# Altium PCB BD4_dy_V1.0.PcbDoc (part 1 of 2)
Units mil, origin at the board's own origin, x right, y up, seen from the top; angles counter-clockwise.
Board outline 5358.3 x 5259.87 mil, 4 copper layers (Top Layer, Signal Layer 1, Signal Layer 2, Bottom Layer), stack 30.634 mil thick; 170 components, 120 nets, 593 pads, 159 vias.
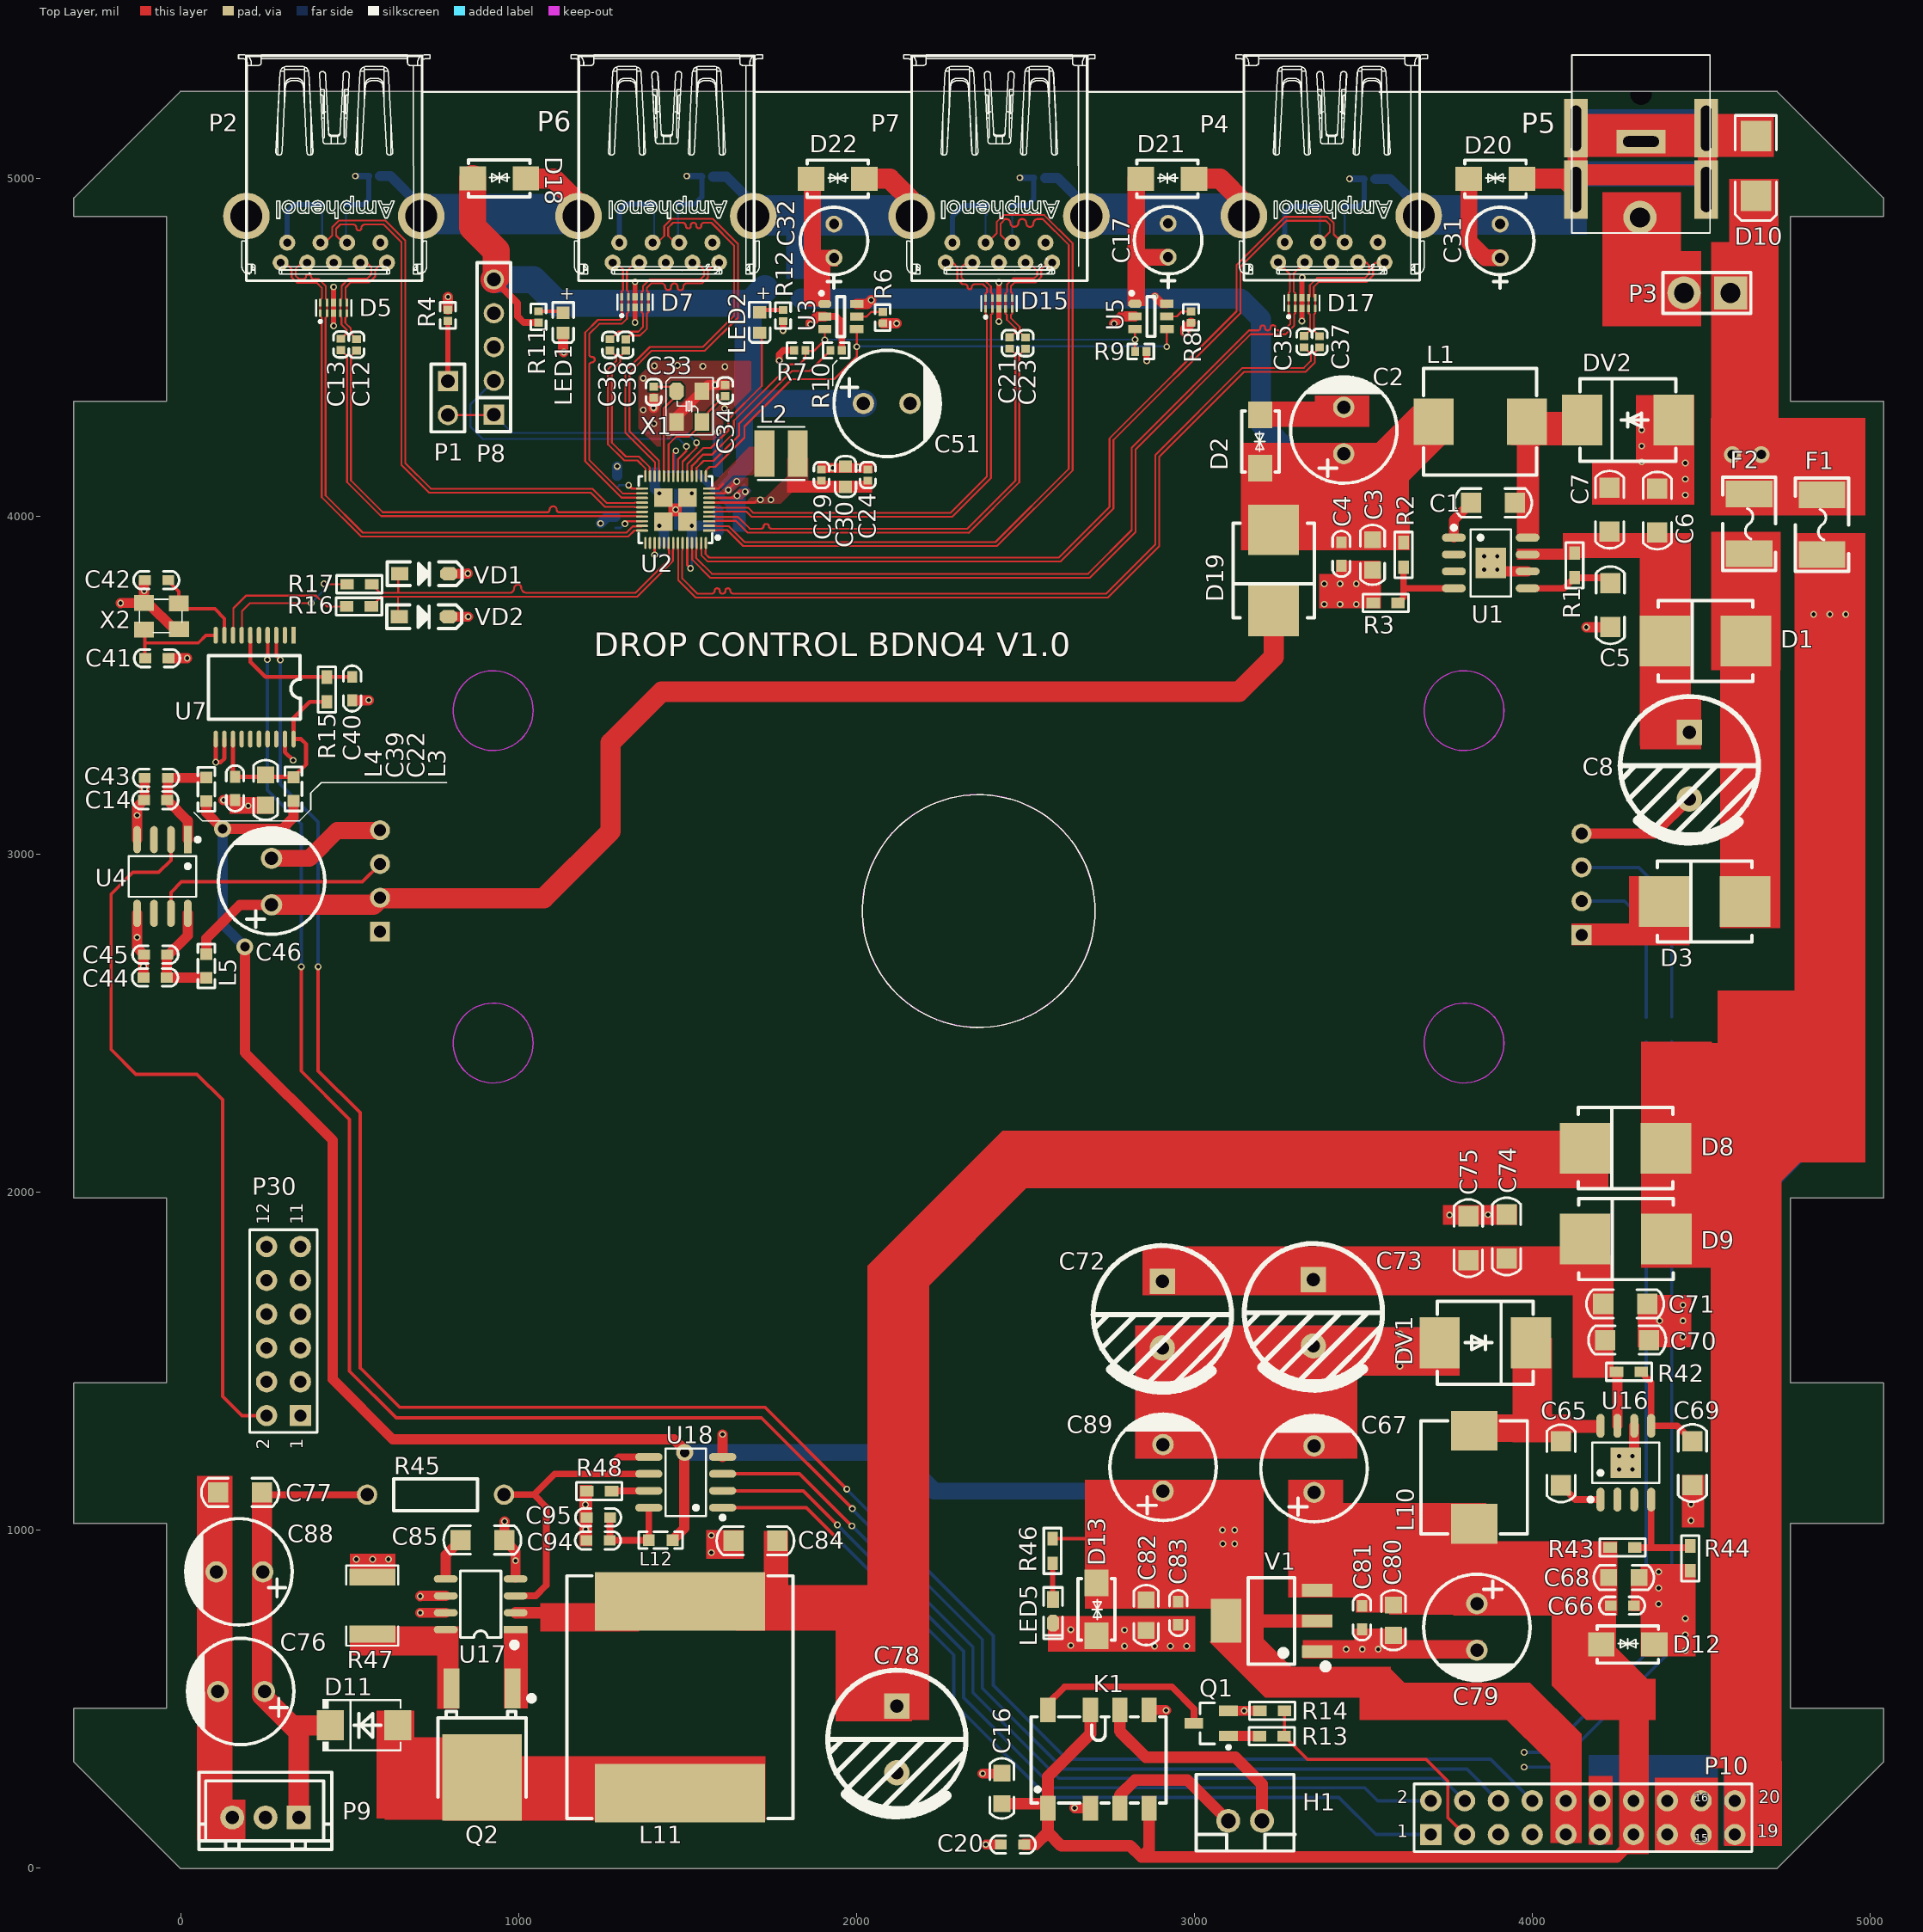
[diagram p0: Top Layer view]
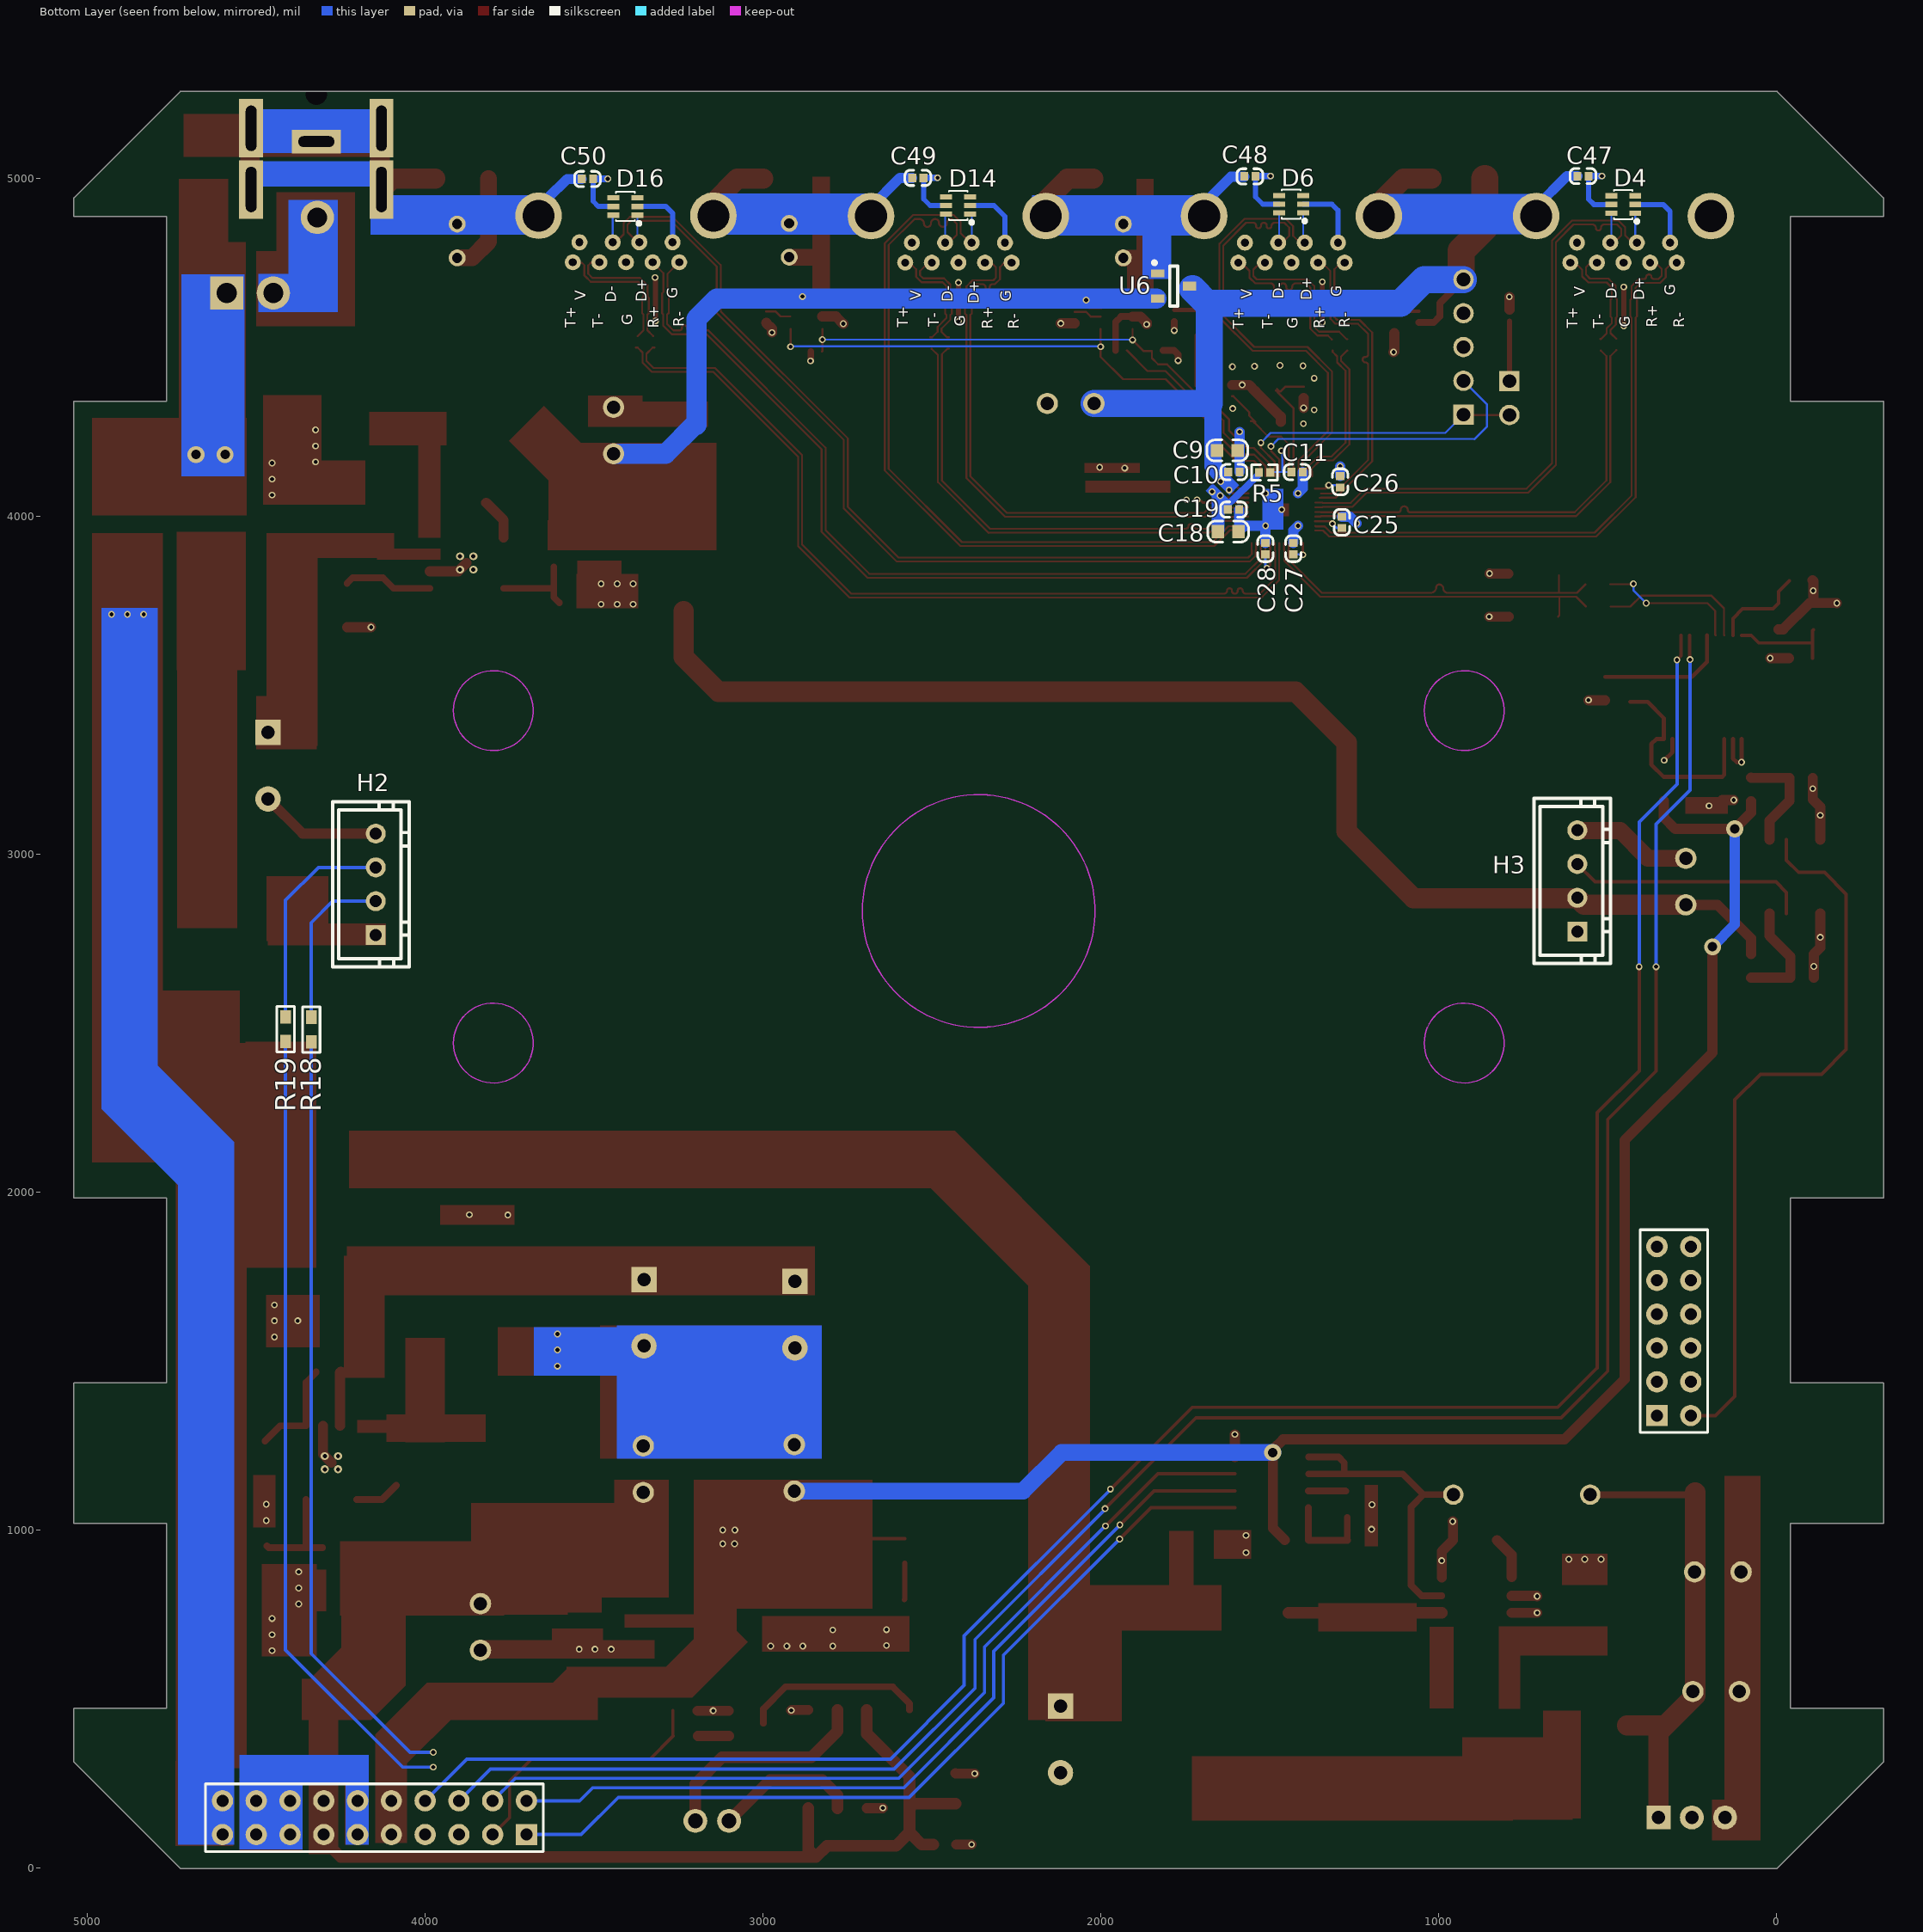
[diagram p1: Bottom Layer view, seen from below]
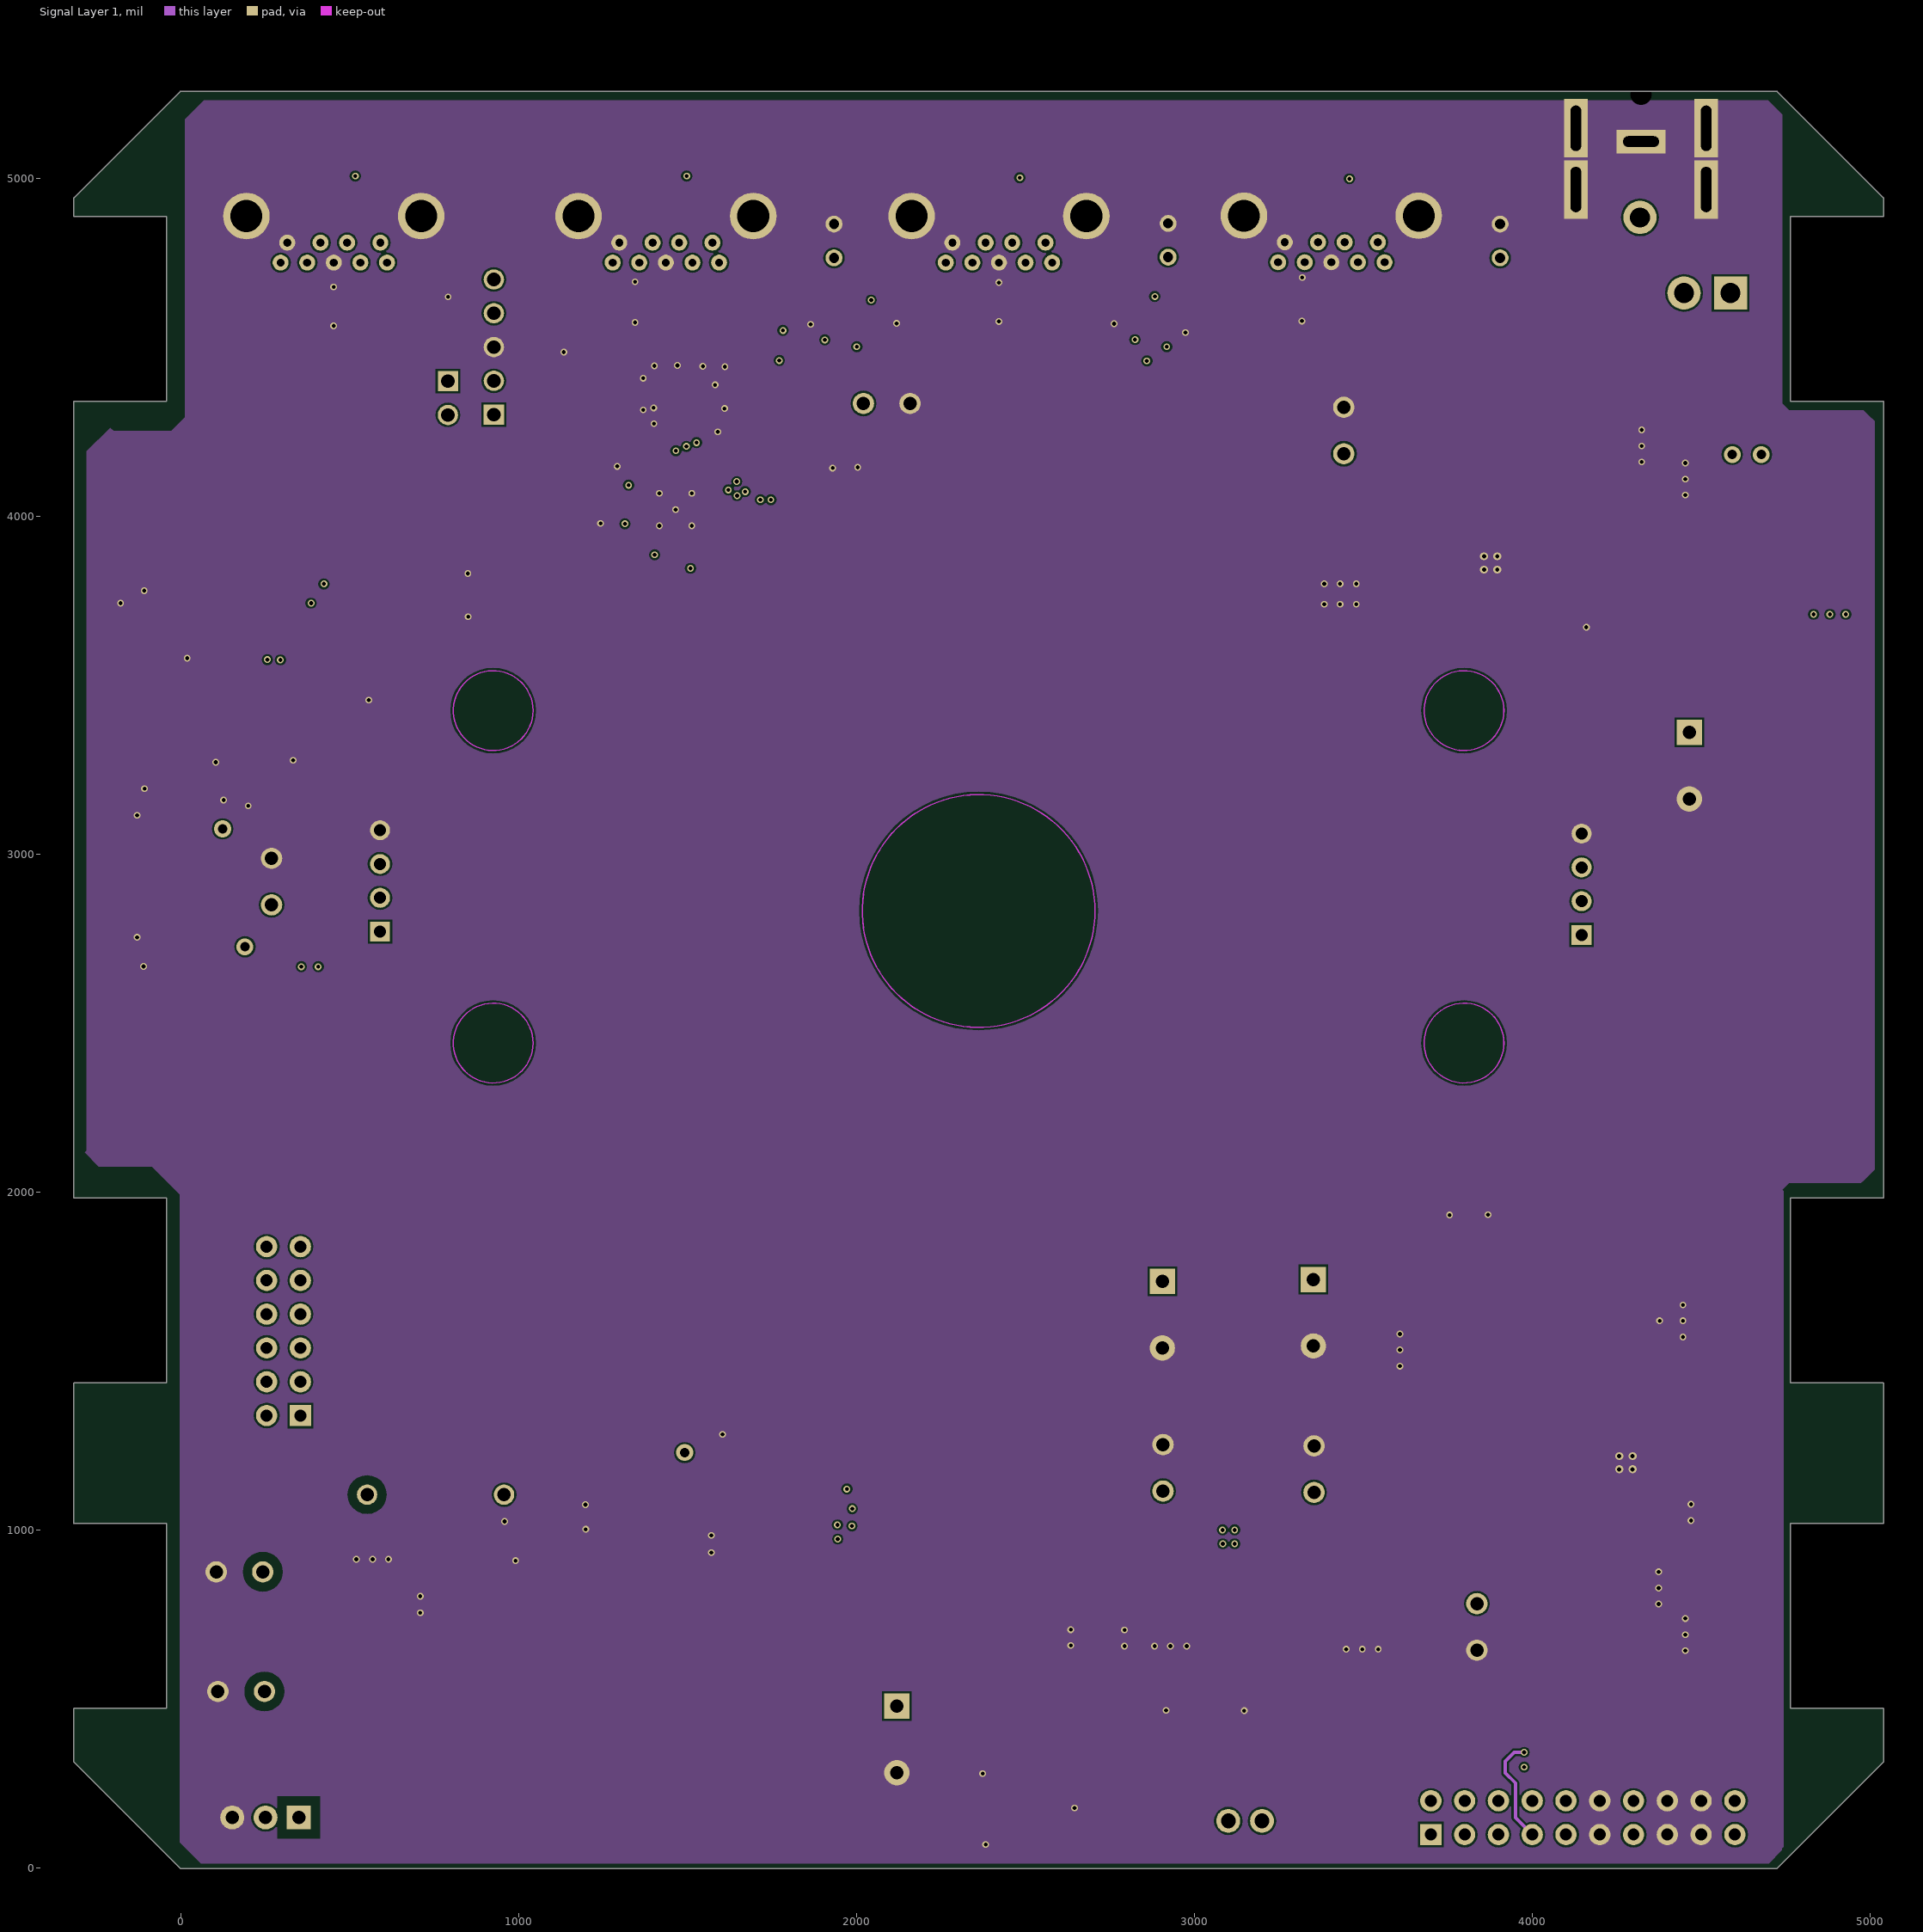
[diagram p2: Signal Layer 1]
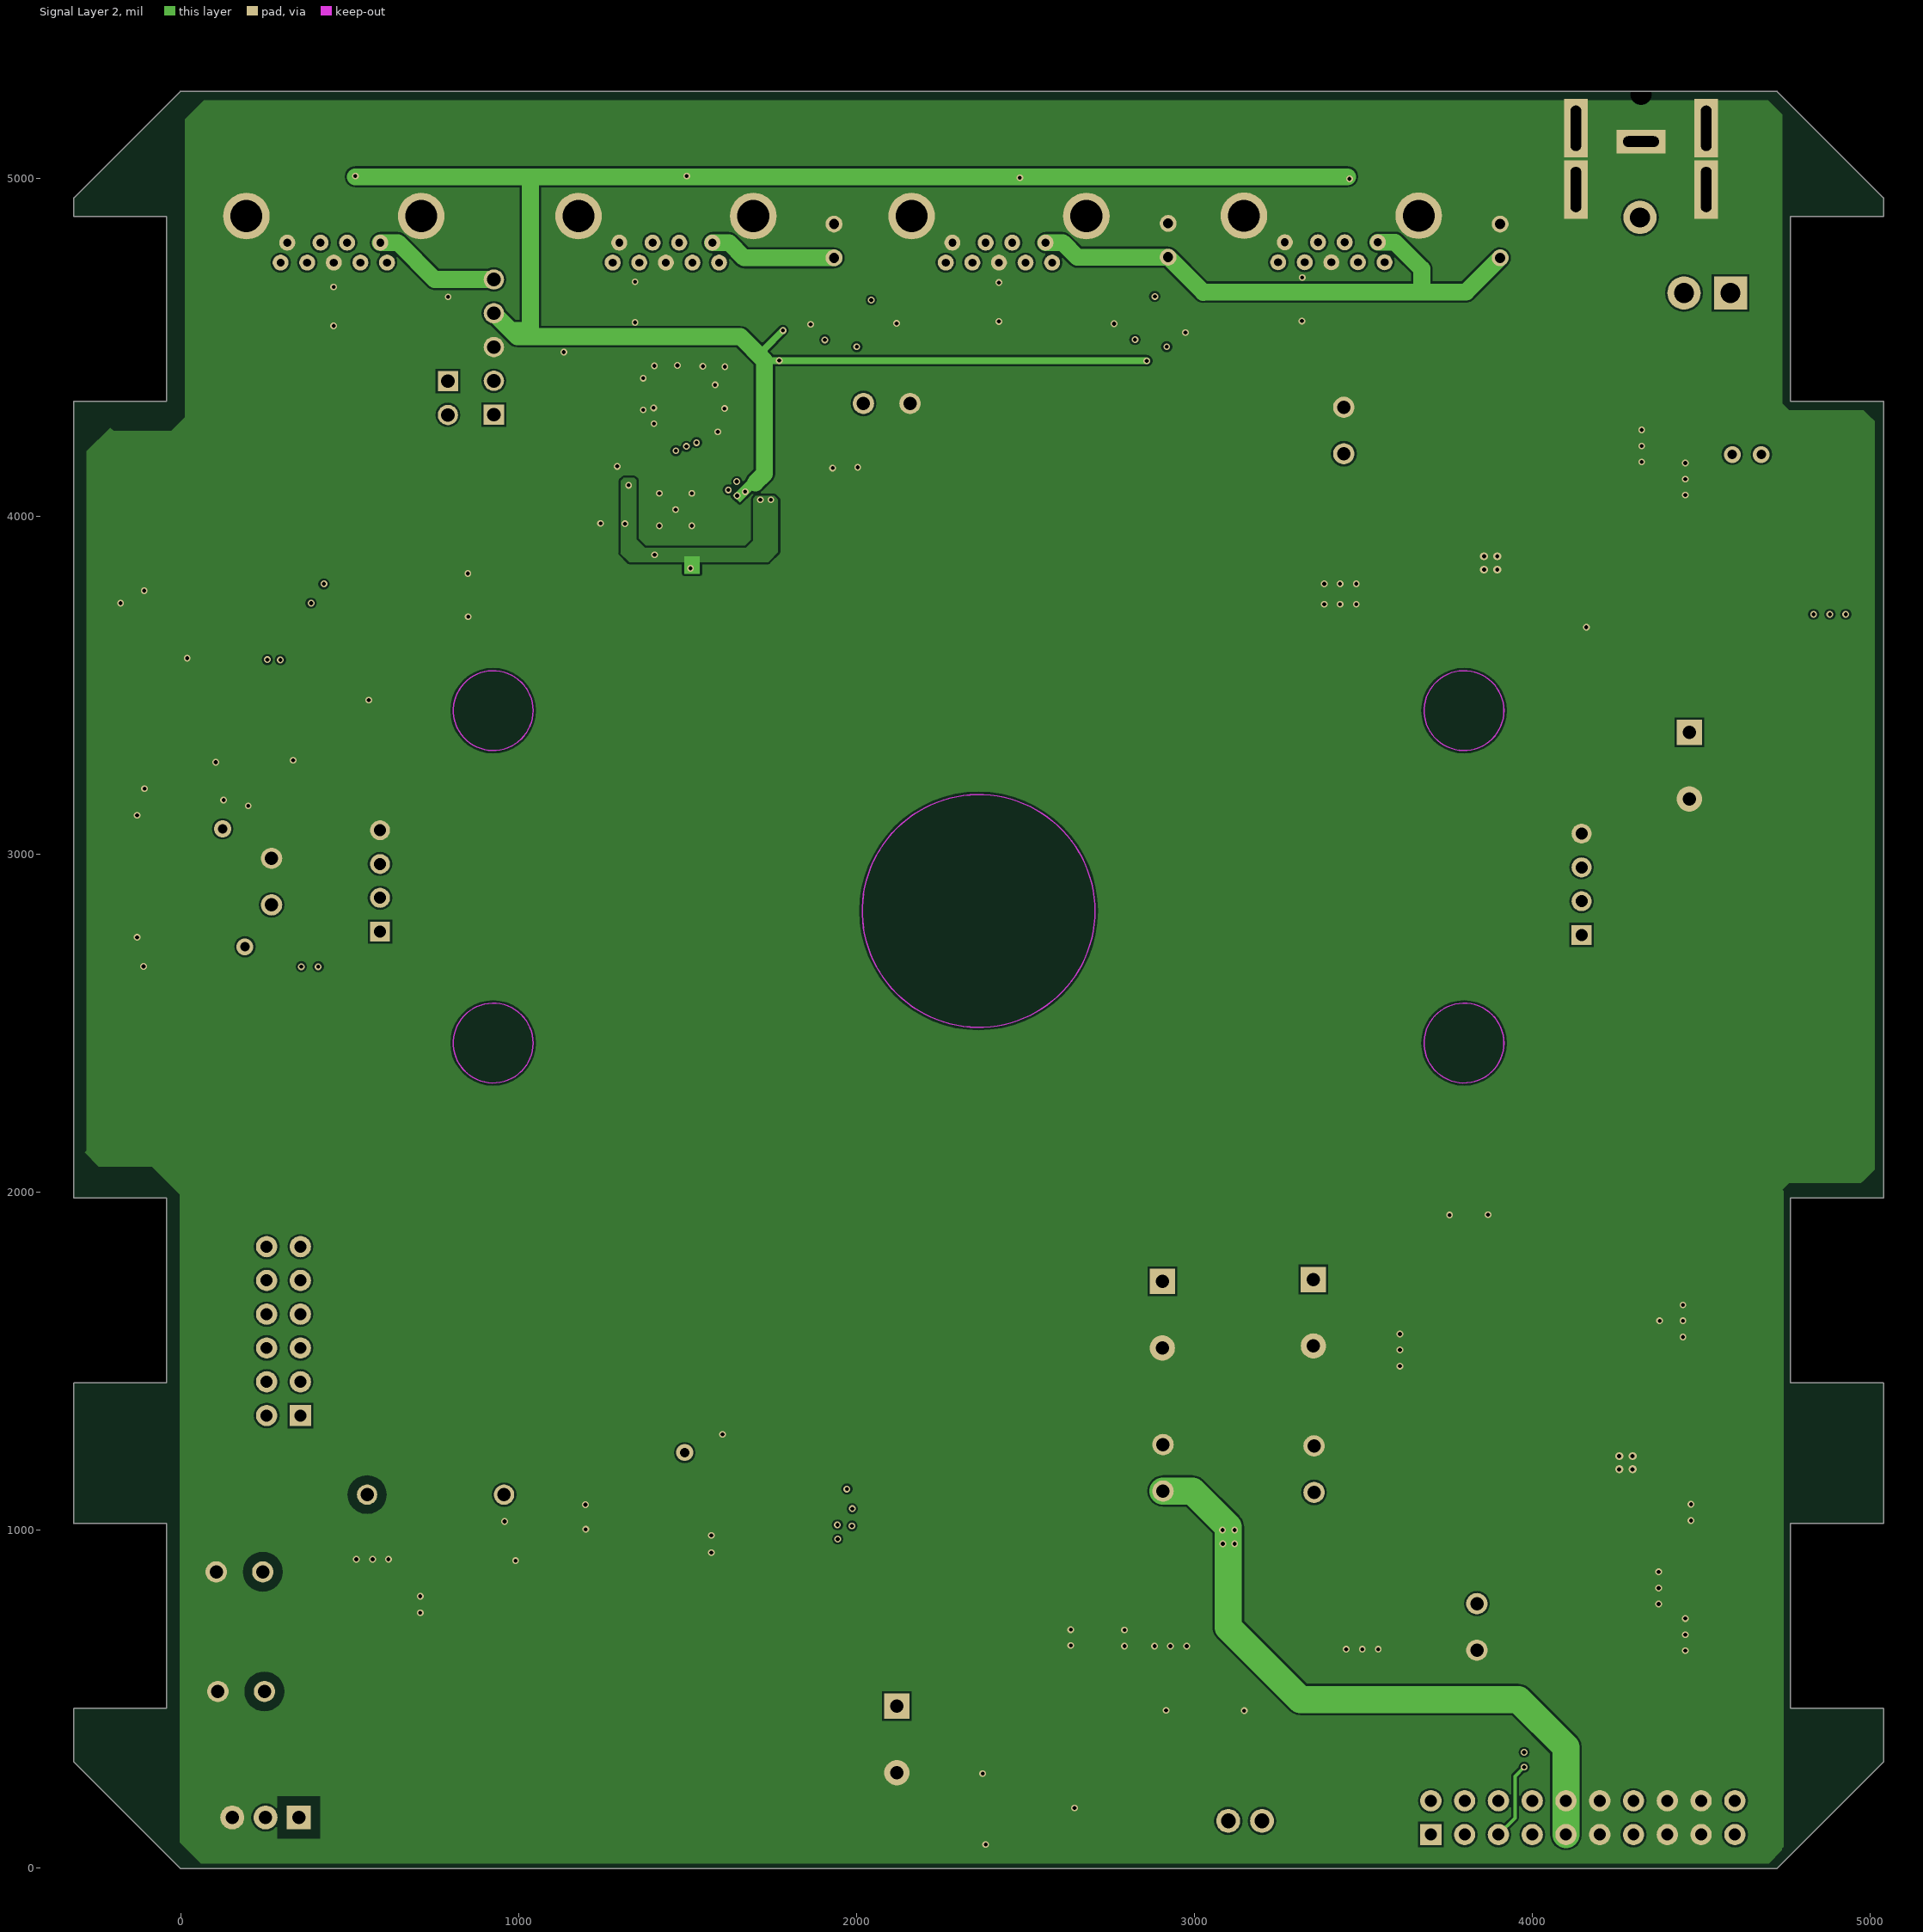
[diagram p3: Signal Layer 2]

## Layer stack, top to bottom
Top Layer: signal copper 1.4
Dielectric: core 10, FR-4, Dk 4.2
Signal Layer 1: signal copper 1.417
Dielectric: prepreg 5, Dk 4.2
Signal Layer 2: signal copper 1.417
Dielectric: core 10, Dk 4.2
Bottom Layer: signal copper 1.4

## Board outline
-316.94,469.82 cw(c-314.96,469.82) -314.96,471.8 -41.35,471.8 -41.35,1019.02 -314.96,1019.02 cw(c-314.96,1021) -316.94,1021 -316.94,1433.07 cw(c-314.96,1433.07) -314.96,1435.05 -41.35,1435.05 -41.35,1982.27 -314.96,1982.27 cw(c-314.96,1984.25) -316.94,1984.25 -316.94,4338.58 cw(c-314.96,4338.58) -314.96,4340.57 -41.35,4340.57 -41.35,4887.78 -314.96,4887.78 cw(c-314.96,4889.76) -316.94,4889.76 -316.94,4940.94 cw(c-314.96,4940.94) -316.35,4942.36 -316.36,4942.35 -1.4,5257.31 -1.41,5257.3 cw(c0,5255.91) 0,5257.89 4724.41,5257.89 cw(c4724.41,5255.91) 4725.82,5257.3 4725.81,5257.31 4725.82,5257.3 5040.76,4942.36 cw(c5039.37,4940.94) 5041.35,4940.94 5041.35,4889.76 cw(c5039.37,4889.76) 5039.37,4887.78 4765.76,4887.78 4765.76,4340.57 5039.37,4340.57 cw(c5039.37,4338.58) 5041.35,4338.58 5041.35,1984.25 cw(c5039.37,1984.25) 5039.37,1982.27 4765.76,1982.27 4765.76,1435.05 5039.37,1435.05 cw(c5039.37,1433.07) 5041.35,1433.07 5041.35,1021.18 cw(c5039.37,1021.18) 5039.37,1019.2 4765.76,1019.2 4765.76,471.98 5039.37,471.98 cw(c5039.37,470) 5041.35,470 5041.35,314.96 cw(c5039.37,314.96) 5040.76,313.55 5040.77,313.56 4725.81,-1.4 4725.82,-1.39 cw(c4724.41,0) 4724.41,-1.98 0,-1.98 cw(c0,0) -1.41,-1.39 -1.4,-1.4 -316.36,313.56 -316.35,313.55 cw(c-314.96,314.96) -316.94,314.96

## Design rules (kind name [scope] priority, off if disabled: settings)
Clearance Clearance_2 [InComponent('U4')] p1: gap=7
Clearance Clearance_4 [InComponent('U11')] p2: gap=7
Clearance Clearance_1 [InComponent('USB1')] p3: gap=6
Clearance Clearance_3 [InNetClass('HV Class')] p4: gap=27
Clearance [All] p5: gap=6
DiffPairsRouting DiffPair_UsbDiffPairsRouting [InDifferentialPairClass('90oum')] p1: maxlimit=6 minlimit=6 mostfreqgap=6 maxuncoupledlength=500
DiffPairsRouting [All] p2: maxlimit=6 minlimit=6 mostfreqgap=6 maxuncoupledlength=10
HoleSize [All] p1: absolutevalues=TRUE maxlimit=99999 minlimit=1 maxpercent=80.000 minpercent=20.000
MatchedLengths DiffPair_UsbMatchedLengths [All] p1: tolerance=5 checknetsindiffpair=TRUE checkdiffpairvsdiffpair=TRUE checkothers=TRUE
MinimumSolderMaskSliver [All] p1: minsoldermaskwidth=0
PlaneConnect [InPadClass('All Pads')] p1: planeconnectstyle=Direct reliefexpansion=20 reliefentries=4 reliefconductorwidth=10 reliefairgap=10
PolygonConnect PolygonConnect_2 [IsVia] p1: connectstyle=Direct reliefconductorwidth=10 reliefentries=4 polygonreliefangle="90 Angle" airgapwidth=10
PolygonConnect PolygonConnect_1 [All vs InNet('GND')] p2: connectstyle=Direct reliefconductorwidth=10 reliefentries=4 polygonreliefangle="90 Angle" airgapwidth=10
PolygonConnect [All] p3: connectstyle=Direct reliefconductorwidth=10 reliefentries=4 polygonreliefangle="90 Angle" airgapwidth=10
RoutingVias RoutingVias_1 [All] p1: holewidth=12 width=20 viastyle="Through Hole" minholewidth=12 minwidth=20 maxholewidth=12 maxwidth=20
RoutingVias [All] p2: holewidth=12 width=100 viastyle="Through Hole" minholewidth=20 minwidth=100 maxholewidth=50 maxwidth=100
SilkToSilkClearance [All] p1: silktosilkclearance=0
SilkToSolderMaskClearance [IsPad] p1: minsilkscreentomaskgap=0 clearancetoexposedcopper=TRUE
SolderMaskExpansion [All] p1: expansion=4
Width DiffPair_UsbWidth [InDifferentialPairClass('90oum')] p1: maxlimit=5.59 minlimit=5.59 preferedwidth=5.59
Width [All] p2: maxlimit=200 minlimit=5.59 preferedwidth=5.59
22 further rules are at their usual default settings.

## Classes and differential pairs
net class "HV Class": NetC76_1 NetD11_2
differential pair class 90oum: P1_AS_DX P1_SS_RX P1_SS_TX P1C P2_AS_DX P2_SS_RX P2_SS_TX P2C P3_AS_DX P3_SS_RX P3_SS_TX P3C P4_AS_DX UP_AS_DX UP_SS_RX UP_SS_TX UPC
component class USBhub-CH634M-R0-1v1: C9 C10 C11 C12 C13 C17 C18 C19 C21 C23 C24 C25 C26 C27 C28 C29 C30 C31 C32 C33 C34 C35 C36 C37 C38 C47 C48 C49 C50 C51 D4 D5 D6 D7 D14 D15 D16 D17 D18 D20 D21 D22 L2 LED1 LED2 P1 P2 P4 P6 P7 P8 R4 R5 R6 R7 R8 R9 R10 R11 R12 U2 U3 U5 U6 X1
component class Power: C1 C2 C3 C4 C5 C6 C7 C8 C65 C66 C67 C68 C69 C70 C71 C72 C73 C74 C75 C76 C77 C78 C79 C80 C81 C82 C83 C84 C85 C88 C89 C94 C95 D1 D2 D3 D8 D9 D10 D11 D12 D13 DV1 DV2 F1 F2 L1 L10 L11 L12 LED5 P3 P5 Q2 R1 R2 R3 R42 R43 R44 R45 R46 R47 R48 U1 U16 U17 U18 V1
component class Connect: C14 C16 C20 C22 C39 C40 C41 C42 C43 C44 C45 C46 D19 H1 H2 H3 K1 L3 L4 L5 P9 P10 P30 Q1 R13 R14 R15 R16 R17 R18 R19 U4 U7 VD1 VD2 X2
differential pair UP_SS_TX: +UP_SS_TX_P -UP_SS_TX_N
differential pair UP_AS_DX: +UP_AS_DX_P -UP_AS_DX_N
differential pair P4_AS_DX: +P4_AS_DX_P -P4_AS_DX_N
differential pair P3_SS_TX: +P3_SS_TX_P -P3_SS_TX_N
differential pair P3_SS_RX: +P3_SS_RX_P -P3_SS_RX_N
differential pair P3_AS_DX: +P3_AS_DX_P -P3_AS_DX_N
differential pair P2_SS_TX: +P2_SS_TX_P -P2_SS_TX_N
differential pair P2_SS_RX: +P2_SS_RX_P -P2_SS_RX_N
differential pair P2_AS_DX: +P2_AS_DX_P -P2_AS_DX_N
differential pair P1_SS_TX: +P1_SS_TX_P -P1_SS_TX_N
differential pair P1_SS_RX: +P1_SS_RX_P -P1_SS_RX_N
differential pair P1_AS_DX: +P1_AS_DX_P -P1_AS_DX_N
differential pair UP_SS_RX: +UP_SS_RX_P -UP_SS_RX_N
differential pair P1C: +P1C_P -P1C_N
differential pair P2C: +P2C_P -P2C_N
differential pair P3C: +P3C_P -P3C_N
differential pair UPC: +UPC_P -UPC_N

## Components (designator, comment, footprint, x,y, rotation, side; value= is the part's Value field where it differs from the comment)
C1 "0.01uF" "C 1206" 3885,4040 r180 top
C2 "470uF /16V" CAP-TH_BD8.0-P3.50-D0.6-FD 3443,4254 r90 top
C3 "10uF" "C 0805" 3528,3886 r90 top
C4 "0.1uF" "C 0603" 3436,3889 r90 top
C5 "0.1uF/50V" "C 1206" 4232,3737 r90 top
C6 "0.1uF/50V" "C 1206" 4371,4017 r270 top
C7 "10uF/50V" "C 1206" 4230,4020 r270 top
C8 "220UF/50V" "CAP 5.0*10*12.5" 4466,3262 r270 top
C9 "10uF" 0603_C 1596,4195 r0 bottom
C10 "0.1uF" 0402_C 1590,4131 r270 bottom
C11 "NC(0.1uF)" 0402_C 1403,4131 r270 bottom
C12 "0.1uF" 0402_C 474.6,4525.3 r0 top
C13 "0.1uF" 0402_C 520.5,4524.3 r0 top
C14 "1uF" "C 0603" -75,3160 r180 top
C16 "10uF" "C 0805" 2431,235 r270 top
C17 "100uF" CD0.1 2923,4767 r90 top
C18 "10uF" 0603_C 1654,3955 r180 bottom
C19 "0.1uF" 0402_C 1591,4020 r270 bottom
C20 "0.1uF" "C 0603" 2463,69 r0 top
C21 "0.1uF" 0402_C 2453.9,4529.7 r0 top
C22 "10uF" "C 0805" 251.32,3190 r90 top
C23 "0.1uF" 0402_C 2501.4,4529.1 r0 top
C24 "0.1uF" 0402_C 2034,4139 r0 top
C25 "0.1uF" 0402_C 1287,3999 r180 bottom
C26 "0.1uF" 0402_C 1292,4119 r180 bottom
C27 "0.1uF" 0402_C 1430.55,3921.02 r180 bottom
C28 "0.1uF" 0402_C 1513.23,3921.02 r180 bottom
C29 "1uF" 0402_C 1897,4139 r0 top
C30 "10uF" 0603_C 1968,4087 r90 top
C31 "100uF" CD0.1 3906,4765 r90 top
C32 "100uF" CD0.1 1934,4765 r90 top
C33 "20pF" 0402_C 1400,4384 r0 top
C34 "20pF" 0402_C 1612,4389 r0 top
C35 "0.1uF" 0402_C 3326,4533.8 r0 top
C36 "0.1uF" 0402_C 1271,4524 r0 top
C37 "0.1uF" 0402_C 3371.8,4533.3 r0 top
C38 "0.1uF" 0402_C 1317.1,4523.8 r0 top
C39 "0.1uF" "C 0603" 161,3195 r90 top
C40 "0.1uF" "C 0603" 507.5,3490.5 r90 top
C41 "20PF" "C 0603" -70,3580 r0 top
C42 "20PF" "C 0603" -72,3811 r180 top
C43 "0.1uF" "C 0603" -73,3226 r180 top
C44 "0.1uF" "C 0603" -76,2635 r180 top
C45 "1uF" "C 0603" -75,2703 r180 top
C46 "470uF /16V" CAP-TH_BD8.0-P3.50-D0.6-FD 269,2919 r90 top
C47 "0.1uF" 0402_C 590,5007 r90 bottom
C48 "0.1uF" 0402_C 1576,5006 r90 bottom
C49 "0.1uF" 0402_C 2559,5001.68 r90 bottom
C50 "0.1uF" 0402_C 3537,4998.38 r90 bottom
C51 "470uF /16V" CAP-TH_BD8.0-P3.50-D0.6-FD 2090,4334 r0 top (schematic designator C15)
C65 "0.01uF" "C 1206" 4086,1197 r270 top
C66 "0.1uF" "C 0603" 4267,776 r180 top
C67 "470uF /16V" CAP-TH_BD8.0-P3.50-D0.6-FD 3355,1180 r90 top
C68 "10uF" "C 0805" 4272,859 r180 top
C69 "0.1uF/50V" "C 1206" 4475,1198 r90 top
C70 "0.1uF/50V" "C 1206" 4282,1562 r180 top
C71 "10uF/50V" "C 1206" 4276,1669 r180 top
C72 "220UF/50V" "CAP 5.0*10*12.5" 2906,1637 r270 top
C73 "220UF/50V" "CAP 5.0*10*12.5" 3353,1643 r270 top
C74 "10uF/50V" "C 1206" 3925,1868.69 r270 top
C75 "0.1uF/50V" "C 1206" 3812,1863.69 r270 top
C76 "4.7uF/400V" CAP-TH_BD8.0-P3.50-D0.6-FD 179,522 r180 top
C77 "0.1uF/450V" "C 1206" 176,1111 r0 top
C78 "220UF/50V" "CAP 5.0*10*12.5" 2120,380 r270 top
C79 "470uF /16V" CAP-TH_BD8.0-P3.50-D0.6-FD 3837,713 r270 top
C80 "10uF" "C 0805" 3590,733 r90 top
C81 "0.1uF" "C 0603" 3497,741 r90 top
C82 "10uF" "C 0805" 2858,748 r90 top
C83 "0.1uF" "C 0603" 2953,754 r90 top
C84 "0.1uF/50V" "C 1206" 1701,968 r0 top
C85 "0.1uF/50V" "C 1206" 893,970 r180 top
C88 "4.7uF/400V" CAP-TH_BD8.0-P3.50-D0.6-FD 174,876 r180 top
C89 "470uF /16V" CAP-TH_BD8.0-P3.50-D0.6-FD 2908,1184 r90 top
C94 "1uF" "C 0603" 1235,969 r180 top
C95 "0.1uF" "C 0603" 1236,1037 r180 top
D1 "MBRS330T3" MBRS340 4634,3631 r180 top
D2 "SMAJ5.0CA" SMA_L4.4-W2.6-LS5.0-BI 3196.1,4221.1 r270 top
D3 "MBRS330T3" MBRS340 4631,2860 r180 top
D4 "CH412K" SOT-363_L2.0-W1.3-P0.65-LS2.1-BR 454,4923 r180 bottom
D5 "TPD4E02B04QDQARQ1" USON-10_L2.5-W1.0-P0.50-BL 452.7,4616.7 r0 top
D6 "CH412K" SOT-363_L2.0-W1.3-P0.65-LS2.1-BR 1437,4924 r180 bottom
D7 "TPD4E02B04QDQARQ1" USON-10_L2.5-W1.0-P0.50-BL 1345,4634 r0 top
D8 "MBRS330T3" MBRS340 4397,2130 r180 top
D9 "MBRS330T3" MBRS340 4398,1861 r180 top
D10 "SMBJ18CA" SMB 4663,5037 r270 top
D11 "ES2J" SMB_L4.4-W3.6-LS5.4-RD 543,422 r0 top
D12 "SMAJ5.0CA" SMA_L4.4-W2.6-LS5.0-BI 4284,661 r180 top
D13 "SMAJ3.3CA" SMA_L4.4-W2.6-LS5.0-BI 2711,765 r90 top
D14 "CH412K" SOT-363_L2.0-W1.3-P0.65-LS2.1-BR 2423,4920 r180 bottom
D15 "TPD4E02B04QDQARQ1" USON-10_L2.5-W1.0-P0.50-BL 2422.2,4629.8 r0 top
D16 "CH412K" SOT-363_L2.0-W1.3-P0.65-LS2.1-BR 3408,4917 r180 bottom
D17 "TPD4E02B04QDQARQ1" USON-10_L2.5-W1.0-P0.50-BL 3319,4631 r0 top
D18 "SMAJ5.0CA" SMA_L4.4-W2.6-LS5.0-BI 943,5000 r180 top
D19 "MBRS330T3" MBRS340 3235.6,3960 r270 top (schematic designator D3)
D20 "SMAJ5.0CA" SMA_L4.4-W2.6-LS5.0-BI 3892,4999 r180 top
D21 "SMAJ5.0CA" SMA_L4.4-W2.6-LS5.0-BI 2921,4999 r180 top
D22 "SMAJ5.0CA" SMA_L4.4-W2.6-LS5.0-BI 1945,4999 r180 top
DV1 "B540C" SMC_L7.1-W6.2-LS8.1-RD 3862,1554 r180 top
DV2 "B540C" SMC_L7.1-W6.2-LS8.1-RD 4284,4285 r0 top
F1 "MSMD200-25V 4A" "FU 1812" 4859,3975 r270 top
F2 "MSMD200-25V 4A" "FU 1812" 4643,3978 r270 top
H1 "Header 2H" CONN-TH_2P-P2.54_ZX-XH2.54-2PZZ-Y 3151,139 r0 top
H2 "#NAME?" CONN-TH_4P-P2.50_ZX-XH2.54-4PZZ-Y 4147,2911 r270 bottom
H3 "#NAME?" CONN-TH_4P-P2.50_ZX-XH2.54-4PZZ-Y 590,2921 r270 bottom
K1 "G6K-2F-Y-DC5" RELAY-SMD_G6K-2F-Y 2717,322 r0 top
L1 "15uH /5A" IND-SMD_L8.5-W8.0_PCC-M0854M 3847,4280 r180 top
L2 "2.2uH" CD32 1777,4186 r0 top
L3 "120欧姆磁珠" "L 0603" 334,3193 r90 top
L4 "120欧姆磁珠" "L 0603" 76,3192 r90 top
L5 "120欧姆磁珠" "L 0603" 76,2669 r90 top
L10 "15uH /5A" IND-SMD_L8.5-W8.0_PCC-M0854M 3829,1156 r270 top
L11 "100uH" IND-SMD_L18.3-W17.0 1478,505 r270 top
L12 "120欧姆磁珠" "L 0603" 1421,970 r180 top
LED1 "5V" 0603+ 1132,4603 r270 top
LED2 "SUSP" 0603+ 1714,4604 r270 top
LED5 "绿色" "LED 0603G" 2582,759 r270 top
P1 "Port Swap" SIP2-2.54mm 791,4400 r180 top
P2 "PC" USB3.0-A-Receptacle 591,4810 r180 top locked
P3 "Header 2" SIP2-3.5mm 4588,4661 r90 top
P4 "Port 3" USB3.0-A-Receptacle 3544,4811 r180 top locked
P5 "DC_plug" POWERPLUG_slc 4323,5365 r0 top locked (schematic designator P3)
P6 "Port 4" USB3.0-A-Receptacle 1574,4810 r180 top locked (schematic designator P3)
P7 "Port 4" USB3.0-A-Receptacle 2560,4810 r180 top locked
P8 "" SIP5-2.54mm 927,4301 r180 top (schematic designator P4)
P9 "HX-XH2.54-3PZZ-R" CONN-TH_3P-P2.50_HX-XH2.54-3PZZ-B 251,149 r0 top
P10 "Header 10X2" HDR-10X2 3700.79,98.43 r0 top
P30 "Header 6X2" HDR-6X2 354.33,1338.58 r90 top
Q1 "9013" SOT23 3050.51,427.75 r180 top
Q2 "MOT65R600D" TO-252-3_L6.6-W6.1-P4.58-LS10.1-BR-1 892,399 r90 top
R1 "100K" "R 0603" 4126,3855 r90 top
R2 "10K" "R 0603" 3620,3886 r270 top
R3 "3.16K" "R 0603" 3567,3744 r180 top
R4 "10K" 0402 791,4578 r90 top
R5 "0Ω(10K)" 0402 1499,4130 r0 bottom
R6 "24K" 0402 2078,4605 r270 top
R7 "NC(51K)" 0402 1816,4491 r0 top
R8 "24K" 0402 2991,4606 r270 top
R9 "NC(51K)" 0402 2859,4488 r180 top
R10 "NC(10K)" 0402 1957,4491 r180 top
R11 "2K" 0402 1059,4607 r270 top
R12 "1K" 0402 1783,4611 r270 top
R13 "1K" "R 0603" 3230,390 r180 top
R14 "10K" "R 0603" 3231,465 r180 top
R15 "0R" "R 0603" 433,3487.5 r90 top
R16 "22R" "R 0603" 528,3733 r0 top
R17 "22R" "R 0603" 529,3799 r0 top
R18 "22R" "R 0603" 4338,2481 r270 bottom
R19 "22R" "R 0603" 4414,2482 r270 bottom
R42 "100K" "R 0603" 4287,1468 r180 top
R43 "10K" "R 0603" 4268,948 r0 top
R44 "3.16K" "R 0603" 4469,916 r270 top
R45 "1.5M" RES-TH_BD2.4-L6.3-P10.30-D0.6 754.5,1104.45 r0 top
R46 "1K" "R 0603" 2581,938 r90 top
R47 "0.1R" "R 1812" 567,776 r90 top
R48 "6.8K" "R 0603" 1239,1115 r180 top
U1 "TPS5450DDAR" SOP-8_L4.9-W3.9-P1.27-LS6.0-BL-EP 3878,3862 r270 top
U2 "CH634M" QFN48_5X5 1465,4020 r90 top
U3 "CH217K" SOT-23-6 1906.75,4628.67 r270 top
U4 "ADUM1200BRZ-RL7" SOIC-8_L4.9-W3.9-P1.27-LS6.0-BL#1 -54,2934 r180 top
U5 "CH217K" SOT-23-6 2825,4629 r270 top
U6 "CH213K" SOT-23-3 1832,4719 r270 bottom
U7 "CH341T" SSOP-20 336,3647 r270 top
U16 "TPS5450DDAR" SOP-8_L4.9-W3.9-P1.27-LS6.0-BL-EP 4278,1199 r0 top
U17 "MAX1771ESA" SOP8_N 888,780 r180 top
U18 "MCP41050-I/SN" SOIC-8_L4.9-W3.9-P1.27-LS6.0-BL#2 1495,1141 r90 top
V1 "AMS1117-3V3" SOT223_M 3229,731 r90 top
VD1 "SMF15CA" SOD-123F 721,3830 r0 top
VD2 "SMF15CA" SOD-123F 720,3703 r0 top
X1 "24MHz" XT3225 1468,4370 r270 top
X2 "12M" XTAL-3225 -57,3704 r270 top

## Footprints (in the part's own frame and the unit in brackets; to place one, negate y for a bottom-side part, rotate by r counter-clockwise, add the part's x,y. Pads: shape width x height; smd on the part's side, far side on the other; paste and mask are expansions set on the pad)
0402 [mm]
  rect 0.6x0.65 smd mask+0.051: 1(0,0) 2(0.85,0)
  silkscreen extent -0.55,-0.58 1.4,0.57
0402_C [mm]
  rect 0.65x0.6 smd mask+0.051: 1(0,0) 2(0,-0.85)
  silkscreen extent -0.58,-1.4 0.57,0.55
0603+ [mm]
  rect 0.93x0.98 smd: 1(0,0) 2(1.54,0)
  silkscreen extent -0.76,-0.79 2.27,0.79
0603_C [mm]
  rect 0.93x0.98 smd mask+0.051: 1(0,0) 2(1.54,0)
  silkscreen extent -0.76,-0.79 2.31,0.79
"C 0603" [mil]
  rect 35x30 smd: 1(-35,0) 2(34,0)
  silkscreen extent -67,-26 67,26, body extent -31,-16 31,16, height 32
"C 0805" [mil]
  rect 50x50 smd: 1(-45,0) 2(45,0)
  silkscreen extent -89,-36 89,36, body extent -39,-24 39,24, height 20
"C 1206" [mil]
  rect 60x60 smd: 1(-65,0) 2(65,0)
  silkscreen extent -115,-42 115,42, body extent -63,-32 63,32, height 48
"CAP 5.0*10*12.5" [mm]
  rect 1.9x1.9 hole 1: 1(-2.5,0)
  round 1.9 hole 1: 2(2.5,0)
  silkscreen extent -5.2,-5.21 5.64,5.2, body extent -5,-5.01 5.01,4.99, height 12.55
CAP-TH_BD8.0-P3.50-D0.6-FD [mm]
  round 1.6 hole 1: 1(-1.75,0) 2(1.75,0)
  silkscreen extent -3.96,-4 4.04,4
CD0.1 [mil]
  round 50 hole 30: 1(0,0) 2(100,0)
  silkscreen extent -90,-100 150,100
CD32 [mm]
  rect 1.5x3.5 smd: 1(-1.25,0) 2(1.25,0)
  silkscreen extent -1.75,-2 1.75,2
CONN-TH_2P-P2.54_ZX-XH2.54-2PZZ-Y [mm]
  round 1.8 hole 1.1 paste+0 mask+0.05: 1(1.27,0) 2(-1.27,0)
  silkscreen extent -3.67,-2.26 3.75,3.49
CONN-TH_3P-P2.50_HX-XH2.54-3PZZ-B [mm]
  rect 1.8x1.8 hole 1 paste+0 mask+0.05: 1(2.5,0)
  round 1.8 hole 1 paste+0 mask+0.05: 2(0,0) 3(-2.5,0)
  silkscreen extent -5,-2.4 5,3.4
CONN-TH_4P-P2.50_ZX-XH2.54-4PZZ-Y [mm]
  rect 1.5x1.5 hole 0.9: 1(3.81,0)
  round 1.5 hole 0.9: 2(1.27,0) 3(-1.27,0) 4(-3.81,0)
  silkscreen extent -6.21,-3.25 6.21,2.5
"FU 1812" [mm]
  rect 2x3.5 smd: 1(-2.25,0) 2(2.25,0)
  silkscreen extent -3.5,-2 3.5,2, body extent -2.3,-1.61 2.3,1.61, height 0.87
HDR-6X2 [mm]
  rect 1.6x1.6 hole 0.9: 1(0,0)
  round 1.6 hole 0.9: 2(0,2.54) 3(2.54,0) 4(2.54,2.54) 5(5.08,0) 6(5.08,2.54) 7(7.62,0) 8(7.62,2.54) 9(10.16,0) 10(10.16,2.54) 11(12.7,0) 12(12.7,2.54)
  silkscreen extent -1.27,-1.27 13.97,3.81, body extent -1.27,-1.27 13.97,3.81, height 8.5
HDR-10X2 [mm]
  rect 1.6x1.6 hole 0.9: 1(0,0)
  round 1.6 hole 0.9: 2(0,2.54) 3(2.54,0) 4(2.54,2.54) 5(5.08,0) 6(5.08,2.54) 7(7.62,0) 8(7.62,2.54) 9(10.16,0) 10(10.16,2.54) 11(12.7,0) 12(12.7,2.54) 13(15.24,0) 14(15.24,2.54) 15(17.78,0) 16(17.78,2.54) 17(20.32,0) 18(20.32,2.54) 19(22.86,0) 20(22.86,2.54)
  silkscreen extent -1.27,-1.27 24.13,3.81, body extent -1.27,-1.27 24.13,3.81, height 8.5
IND-SMD_L8.5-W8.0_PCC-M0854M [mm]
  rect 3x3.5 smd: 1(-3.5,0) 2(3.5,0)
  silkscreen extent -4.25,-4 4.25,4
IND-SMD_L18.3-W17.0 [mm]
  rect 4.4x12.8 smd: 1(-7.2,0) 2(7.2,0)
  silkscreen extent -9.12,-8.5 9.12,8.5
"L 0603" [mil] "С?"
  rect 35x35 smd: 1(-35,0) 2(35,0)
  silkscreen extent -65,-25 65,25, body extent -31,-16 31,16, height 31
"LED 0603G" [mil]
  rect 50x35 smd: 1(-35,0.26)
  oct 50x35 smd: 2(35,0.26)
  silkscreen extent -71,-28 81,28, body extent -31,-16 32,16, height 24
MBRS340 [mil]
  rect 150x150 smd: 1(0,0) 2(240,0)
  silkscreen extent -20,-120 260,120
POWERPLUG_slc [mm]
  rect 1.8x4.4 hole 0.8 slot 3.4 at 90 deg: 0(-4.9,-10.1) 0(-4.9,-5.5) 0(4.9,-10.1) 0(4.9,-5.5)
  round 1 hole 1.6: 0(0,-2.95)
  round 2.5 hole 1.5: 1(-0.076,-12.2)
  rect 3.7x1.8 hole 0.8 slot 2.7 at 0 deg: 2(0,-6.5)
  silkscreen extent -5.2,-13.4 5.2,0
QFN48_5X5 [mm]
  round 0.508 hole 0.305 mask+0.102: 0(-1.219,-1.219) 0(-1.219,1.219) 0(0,0) 0(1.219,-1.219) 0(1.219,1.219)
  rect 1.397x1.397 smd mask+0: 0(-0.901,-0.895) 0(-0.901,0.908) 0(0.902,-0.895) 0(0.902,0.908)
  rect 0.18x0.9 smd mask+0.051: 1(-1.575,-2.519)
  oval 0.18x0.9 smd mask+0.051: 2(-1.225,-2.519) 3(-0.875,-2.519) 4(-0.525,-2.519) 5(-0.175,-2.519) 6(0.175,-2.519) 7(0.525,-2.519) 8(0.875,-2.519) 9(1.225,-2.519) 10(1.575,-2.519) 25(1.575,2.519) 26(1.225,2.519) 27(0.875,2.519) 28(0.525,2.519) 29(0.175,2.519) 30(-0.175,2.519) 31(-0.525,2.519) 32(-0.875,2.519) 33(-1.225,2.519) 34(-1.575,2.519)
  oval 0.9x0.18 smd mask+0.051: 11(2.514,-2.275) 12(2.514,-1.925) 13(2.514,-1.575) 14(2.514,-1.225) 15(2.514,-0.875) 16(2.514,-0.525) 17(2.514,-0.175) 18(2.514,0.175) 19(2.514,0.525) 20(2.514,0.875) 21(2.514,1.225) 22(2.514,1.575) 23(2.514,1.925) 24(2.514,2.275) 35(-2.514,2.275) 36(-2.514,1.925) 37(-2.514,1.575) 38(-2.514,1.225) 39(-2.514,0.875) 40(-2.514,0.525) 41(-2.514,0.175) 42(-2.514,-0.175) 43(-2.514,-0.525) 44(-2.514,-0.875) 45(-2.514,-1.225) 46(-2.514,-1.575) 47(-2.514,-1.925) 48(-2.514,-2.275)
  silkscreen extent -2.51,-3.31 2.51,2.77
"R 0603" [mil]
  rect 40x31.5 smd: 1(-36.5,0) 2(36.5,0)
  silkscreen extent -68,-26 68,26, body extent -31,-16 32,16, height 16
"R 1812" [mil]
  rect 50.49x136.06 smd paste-3937.01 mask+2: 1(-84.3,0) 2(84.3,0)
  silkscreen extent -119,-77 119,77
RELAY-SMD_G6K-2F-Y [mm]
  rect 1.15x1.85 smd: 1(-3.81,-3.692) 2(-0.6,-3.692) 3(1.6,-3.692) 4(3.8,-3.692) 5(3.8,3.692) 6(1.6,3.692) 7(-0.6,3.692) 8(-3.81,3.692)
  silkscreen extent -5.08,-3.3 5.08,3.17
RES-TH_BD2.4-L6.3-P10.30-D0.6 [mil]
  round 60 hole 39.37: 1(-202.76,0) 2(202.76,0)
  silkscreen extent -124,-47 124,47
SIP2-2.54mm [mil]
  rect 60x60 hole 40: 1(0,0)
  round 60 hole 40: 2(0,100)
  silkscreen extent -50,-50 50,150
SIP2-3.5mm [mm]
  rect 2.5x2.5 hole 1.5: 1(0,0)
  round 2.5 hole 1.5: 2(0,3.5)
  silkscreen extent -1.52,-1.52 1.52,5.08
SIP5-2.54mm [mil]
  rect 60x60 hole 40: 1(0,0)
  round 60 hole 40: 2(0,-100) 3(0,-200) 4(0,-300) 5(0,-400)
  silkscreen extent -50,-450 50,50
SMA_L4.4-W2.6-LS5.0-BI [mm]
  rect 2x1.8 smd: 1(-2,0) 2(2,0)
  silkscreen extent -2.3,-1.4 2.3,1.4
SMB [mm] "DO-214-AA/SMB; 2 C-Bend Leads; Body 5.3 x 3.6 mm, in"
  rect 2.3x2.3 smd: 1(-2.25,0) 2(2.25,0)
  silkscreen extent -3.8,-1.55 4.1,1.55
SMB_L4.4-W3.6-LS5.4-RD [mil]
  rect 80.61x88.23 smd: 1(-100,0) 2(100,0)
  silkscreen extent -123,-77 108,77
SMC_L7.1-W6.2-LS8.1-RD [mm]
  rect 3.03x3.82 smd: 1(-3.435,0) 2(3.435,0)
  silkscreen extent -3.6,-3.11 3.6,3.11
SOD-123F [mm]
  rect 1.3x1 smd: 1(-1.85,0)
  oct 1.3x1 smd: 2(1.85,0)
  silkscreen extent -2.79,-0.89 2.84,0.89, body extent -1.9,-0.8 1.9,0.8, height 1.15
SOIC-8_L4.9-W3.9-P1.27-LS6.0-BL#1 [mm]
  rect 0.588x2.045 smd: 1(-1.905,-2.772)
  oval 0.588x2.045 smd: 2(-0.635,-2.772) 3(0.635,-2.772) 4(1.905,-2.772) 5(1.905,2.772) 6(0.635,2.772) 7(-0.635,2.772) 8(-1.905,2.772)
  silkscreen extent -2.8,-2.92 2.53,1.52
SOIC-8_L4.9-W3.9-P1.27-LS6.0-BL#2 [mm]
  oval 0.588x2.045 smd: 1(-1.905,-2.772) 2(-0.635,-2.772) 3(0.635,-2.772) 4(1.905,-2.772) 5(1.905,2.772) 6(0.635,2.772) 7(-0.635,2.772) 8(-1.905,2.772)
  silkscreen extent -2.8,-2.92 2.53,1.52
SOP8_N [mm] "5*6*1"
  rect 1.8x0.55 smd: 1(-2.625,1.905)
  oval 1.8x0.55 smd: 2(-2.625,0.635) 3(-2.625,-0.635) 4(-2.625,-1.905) 5(2.625,-1.905) 6(2.625,-0.635) 7(2.625,0.635) 8(2.625,1.905)
  silkscreen extent -2.69,-2.5 1.52,3.2, body extent -3,-2.5 3,2.5, height 1.9
SOP-8_L4.9-W3.9-P1.27-LS6.0-BL-EP [mm]
  oval 0.6x1.8 smd: 1(-1.905,-2.772) 2(-0.635,-2.772) 3(0.635,-2.772) 4(1.905,-2.772) 5(1.905,2.772) 6(0.635,2.772) 7(-0.635,2.772) 8(-1.905,2.772)
  rect 2.29x2.29 smd: 9(0,0)
  silkscreen extent -2.8,-2.92 2.53,1.52
SOT23 [mm]
  rect 1.4x0.8 smd: 1(-1.3,0.95) 2(-1.3,-0.95) 3(1.3,0)
  Top Layer pour cut-out: -2.032,1.55 -2.032,-1.778 2.032,-1.778 2.032,1.524
  silkscreen extent -1.43,-1.55 0.85,1.92
SOT223_M [mm]
  rect 0.95x2.3 smd: 1(-2.3,-3.429) 2(0,-3.429) 3(2.3,-3.429)
  rect 3.3x2.3 smd: 2(0,3.429)
  silkscreen extent -3.63,-4.26 3.25,1.75, body extent -3.25,-3.51 3.25,3.51, height 1.65
SOT-23-3 [mm] "SOT-23-3"
  rect 0.6x1 smd: 1(0,0) 2(1.9,0)
  rect 0.7x1 smd: 3(0.95,2.4)
  silkscreen extent -0.93,-0.38 2.45,1.49
SOT-23-6 [mm] "SOT-23-6"
  oct 0.6x1 smd: 1(0,0)
  rect 0.6x1 smd: 2(0.95,0) 3(1.9,0) 5(0.95,2.4) 6(0,2.4)
  rect 0.6x1.04 smd: 4(1.9,2.4)
  silkscreen extent -0.93,-0.38 2.45,1.49
SOT-363_L2.0-W1.3-P0.65-LS2.1-BR [mm]
  rect 0.9x0.4 smd paste+0.051: 1(0.9,-0.65) 2(0.9,0) 3(0.9,0.65) 4(-0.9,0.65) 5(-0.9,0) 6(-0.9,-0.65)
  silkscreen extent -0.7,-1.4 1.14,1.1
SSOP-20 [mm]
  rect 1.27x0.33 smd: 1(-0.025,-0.051)
  oval 1.27x0.33 smd: 2(-0.025,-0.701) 3(-0.025,-1.351) 4(-0.025,-2.001) 5(-0.025,-2.651) 6(-0.025,-3.301) 7(-0.025,-3.951) 8(-0.025,-4.601) 9(-0.025,-5.251) 10(-0.025,-5.901) 11(7.775,-5.901) 12(7.775,-5.251) 13(7.775,-4.601) 14(7.775,-3.951) 15(7.775,-3.301) 16(7.775,-2.651) 17(7.775,-2.001) 18(7.775,-1.351) 19(7.775,-0.701) 20(7.775,-0.051)
  silkscreen extent 1.5,-6.45 6.27,0.46
TO-252-3_L6.6-W6.1-P4.58-LS10.1-BR-1 [mm]
  rect 3x1.2 smd: 1(3.343,-2.285) 3(3.343,2.285)
  rect 6.5x6 smd: 2(-3.343,0)
  silkscreen extent -4.83,-3.92 2.81,3.3
USB3.0-A-Receptacle [mm]
  round 3.5 hole 2.4: 0(-3.07,-2) 0(10.07,-2)
  round 1.2 hole 0.6: 1(0,0) 2(2.5,0) 3(4.5,0) 4(7,0) 5(7.5,1.5) 6(5.5,1.5) 7(3.5,1.5) 8(1.5,1.5) 9(-0.5,1.5)
  silkscreen extent -3.14,-14.04 10.07,2.85
USON-10_L2.5-W1.0-P0.50-BL [mm]
  rect 0.2x0.565 smd paste+0.051: 1(-1,-0.4) 2(-0.5,-0.4) 4(0.5,-0.4) 5(1,-0.4) 6(1,0.4) 7(0.5,0.4) 9(-0.5,0.4) 10(-1,0.4)
  rect 0.4x0.565 smd paste+0.051: 3(0,-0.4) 8(0,0.4)
  silkscreen extent -1.33,-1.12 1.33,0.58
XT3225 [mm]
  oct 1.3x1.1 smd: 1(0,0)
  rect 1.3x1.1 smd: 2(2.3,0) 3(2.3,1.9) 4(0,1.9)
  silkscreen extent -1.02,-0.8 3.27,2.74
XTAL-3225 [mil]
  rect 47.24x59.06 smd: 1(-38.5,51) 2(-39.5,-52) 3(39.5,-52) 4(38.5,52)
  silkscreen extent -50,-65 48,61, body extent -50,-65 48,61, height 31

## Part data
C1 C3 C4 C5 C6 C7 C22 C39 C40 C41 C42 C65 C66 C68 C69 C70 C71 C74 C75 C77 C80 C84 C85: library part C, "无极性贴片电容"
C2 C46 C51 C67 C79 C89: library part "JBLE2471M016D090RLM 470UF 16V"
C8 C72 C73 C78: library part C-CAP, "直插电解电容"
C9 C29: library part Cap, "Capacitor"
C10 C11 C12 C13 C17 C18 C19 C21 C23 C24 C25 C26 C27 C28 C30 C31 C32 C33 C34 C35 C36 C37 C38 C47 C48 C49 C50: library part CAP, "Capacitor"
C14 C16 C20 C43 C44 C45 C81 C82 C83 C94 C95: library part C-CC, "直插瓷片电容"
C76 C88: library part ERK2GM4R7F09OT
D1 D3 D8 D9 D19: library part "DIODE SCHOTTKY", "Schottky Diode"
D2 D12 D18 D20 D21 D22: library part SMAJ5.0CA_C83324
D10: library part 1.04.03.0004, "SMBJ36CA,DO-214AA,君耀,RoHS"
D11: library part ES2J_C19078414
D13: library part SMAJ3.3CA_C2959732
DV1 DV2: library part B540C-13-F
F1 F2: library part FU, "贴片保险丝"
H1: "Header, 2-Pin, Right Angle"
H2 H3: library part HB-PH3-25414PB2GOP
K1: library part G6K-2F-Y-DC12
L1 L10: library part PSPMAA0805-150M-ANP
L2: library part Inductor, "Inductor"
L3 L4 L5 L12: library part FERRITBEAD
L11: library part YSPIA1770-101M
LED1 LED2: library part LED, "LED"
LED5: library part LED-SMD, "贴片LED"
P1: library part "HEADER 2", "Header, 2-Pin"
P2 P4 P6 P7: library part USB-AF3.0-90卷
P3: "Header, 2-Pin"
P8: library part "HEADER 5", "Header, 5-Pin"
P10: "Header, 10-Pin, Dual row"
P30: "Header, 6-Pin, Dual row"
Q1: library part 2N2222
R1 R2 R3 R15 R16 R17 R18 R19 R42 R43 R44 R45 R46 R47 R48: library part R, "贴片电阻"
R4 R5 R6 R7 R8 R9 R10 R11 R12: library part RES
R13 R14: library part Res2, "Resistor"
U2: "4 ports USB 3.0 SS hub"
U3 U5: "Current-Limited USB Power Distribution Switch"
U6: "Ideal Diode 5V*1A"
V1: library part AMS1117, "三端稳压芯片"
VD1 VD2: library part DR, "瞬态电压抑制二极管"
X1: library part 晶体
X2: library part XTAL-4, "4脚晶振"

## Via types
v1: diameter 20, hole 12, Top Layer to Bottom Layer, 141 vias
v2: diameter 24, hole 12, Top Layer to Bottom Layer, 8 vias
v3: diameter 50, hole 28, Top Layer to Bottom Layer, 5 vias
v4: diameter 20, hole 12, Top Layer to Bottom Layer, tented both sides, 5 vias

## Nets (pads, with @x,y where several pads share a name; then routed paths per layer and width w, separated by ;. In a path a pad name is that pad's centre, name@x,y a point inside that pad or via, vN(x,y) a via of type N, cw(c..) or ccw(c..) an arc to the next point about the centre after c; other vN are vias at no path point)
5V: C9.2 C10.2 C51.1 D18.2 P2.1 P8.5 R11.2 U2.9 U6.3 | length 2730.5
  Top Layer w7: U2.9@1564.16,4068.23 1610.23,4068.23 1620.5,4078.5 v4@1641.5,4099.5
  Top Layer w20: P8.5@927,4701 997,4631 997,4592 1015.46,4573.54 R11.2@1059,4573.54
  Top Layer w80: D18.2@864.26,5000 864.26,4855.74 934,4786 934,4708 P8.5@927,4701
  Signal Layer 2 w50: P2.1@591,4810 643,4810 752,4701 P8.5@927,4701
  Bottom Layer w50: 1645.12,4124.11 1668.67,4147.66 1668.67,4195 1668.67,4336.5 1680,4336.5 ; 1668.67,4631 1686.91,4631
  Bottom Layer w80: P8.5@927,4701 1043,4701 1113,4631 ; 1114,4630 1113,4631 ; 1668.67,4631 1113,4631 ; 1680,4334.5 1680,4336.5 ; 1680,4629 1680,4336.5 ; 1686.91,4631 U6.3@1729.46,4673.54 ; C51.1@2021.1,4334 1682.5,4334 1680,4336.5
  other v4: 1621,4078 1646,4103
DVDD12: C24.2 C25.2 C26.2 C27.2 C28.2 C29.2 C30.1 L2.2 U2.7 U2.25 U2.32 U2.37 U2.44 | length 500.1
  Top Layer w7: v1(1315,3978) 1322.55,3985.55 U2.32@1365.84,3985.55 ; v1(1326,4092) 1335.99,4082.01 U2.25@1365.84,4082.01 ; U2.37@1402.99,3921.02 v1(1402.99,3886.01) v1@1407.35,3881.65 ; U2.44@1499.45,3921.02 1499.45,3855.55 v1(1509,3846) ; U2.7@1564.16,4040.67 1698.67,4040.67 1703,4045
  Bottom Layer w7: C25.2@1287,3965.54 1302.54,3965.54 v1(1315,3978) ; C26.2@1292,4085.54 1298.46,4092 v1(1326,4092) ; v1(1402.99,3886.01) 1411.7,3886.01 1413.25,3887.56 C27.2@1430.55,3887.56 ; v1(1509,3846) 1513.23,3850.23 C28.2@1513.23,3887.56
  other v1: 1747,4049
  other v4: 1716,4049
GND: C2.2 C3.1 C4.1 C5.1 C6.1 C7.1 C8.2 C9.1 C10.1 C11.1 C14.2 C16.1 C17.2 C18.2 C19.1 C20.1 C22.1 C24.1 C25.1 C26.1 C27.1 C28.1 C29.1 C30.2 C31.2 C32.2 C33.2 C34.1 C39.1 C40.1 C41.2 C42.2 C43.2 C44.2 C45.2 C46.2 C47.1 C48.1 C49.1 C50.1 C51.2 C66.1 C67.2 C68.1 C69.1 C70.1 C71.1 C72.2 C73.2 C74.1 C75.1 C76.2 C77.1 C78.2 C79.2 C80.1 C81.1 C82.1 C83.1 C84.1 C85.1 C88.2 C89.2 C94.2 C95.2 D2.1 D4.2 D5.3 D5.8 D6.2 D7.3 D7.8 D10.1 D12.1 D13.1 D14.2 D15.3 D15.8 D16.2 D17.3 D17.8 D18.1 D20.1 D21.1 D22.1 DV1.2 DV2.2 H2.4 H3.4 K1.2 K1.5 LED1.2 LED5.2 P2.0 P2.4 P2.7 P4.0 P4.4 P4.7 P5.0 P5.2 P6.0 P6.4 P6.7 P7.0 P7.4 P7.7 P8.3 P9.3 P10.11 P10.12 P10.15 P10.16 P10.17 P10.18 Q1.2 R3.2 R4.2 R6.2 R8.2 R10.1 R14.2 R44.2 R47.2 R48.2 U1.6 U1.9 U2.0 U3.2 U4.4 U4.5 U5.2 U6.1 U7.11 U7.12 U7.19 U16.6 U16.9 U17.4 U17.6 U17.7 U18.4 V1.1 VD1.2 VD2.2 X1.2 X1.4 X2.2 X2.4 | length 7104.1
  Top Layer w12: U7.11@103.68,3340.91 v1@103.68,3272.31 ; v1(104,3272) v1@103.68,3272.31 ; U7.12@129.28,3340.91 129.28,3283.28 118.32,3272.31 104,3272.31 v1@103.68,3272.31 ; U7.19@308.41,3340.91 308.41,3302.59 v1(333,3278)
  Top Layer w15: v1(452.7,4563.7) D5.3@452.7,4600.95 D5.8@452.7,4632.45 v1@452.7,4676.7 ; v1(1345,4574) D7.3@1345,4618.25 D7.8@1345,4649.75 v1(1345,4694) ; v1(2422.2,4576.8) D15.3@2422.2,4614.05 D15.8@2422.2,4645.55 v1@2422.2,4689.8 ; v1(3319,4578) D17.3@3319,4615.25 D17.8@3319,4646.75 v1@3319,4707
  Top Layer w20: U3.2@1906.75,4591.27 1940.73,4591.27 1957,4575 R10.1@1957,4491
  Top Layer w30: v1(-178,3743) -177.5,3743.5 X2.2@-109,3743.5 ; U4.5@-129,2824.85 v1(-129,2754) -129,2723 -110,2704 -110,2703 v1(-110,2668) C44.2@-110,2635 ; U4.4@-129,3043.15 v1(-129,3115) -129,3140 C14.2@-109,3160 -107,3162 v1(-107,3194) C43.2@-107,3226 ; C42.2@-106,3811 -109,3808 -109,3780 X2.2@-109,3743.5 ; C41.2@-36,3580 v1(19,3580) ; X2.4@-5,3665.5 -19.5,3665.5 -97.5,3743.5 X2.2@-109,3743.5 ; v1(127,3160) C39.1@161,3160 ; C40.1@507.5,3455.5 556.5,3455.5 v1(557,3456) ; v1(709,755) U17.7@784.65,755 ; v1(709,804) 710,805 U17.6@784.65,805 ; R4.2@791,4611.46 791,4649 v1(791.5,4649.5) ; VD2.2@792.83,3703 v1(851,3703) ; VD1.2@793.83,3830 849,3830 v1(850,3831) ; v1(959,1025) 958,1024 C85.1@958,970 991.35,936.65 v1(991.35,909) U17.4@991.35,859 ; LED1.2@1132,4542.37 1132,4488 v1(1134,4486) ; v1(1400,4321) C33.2@1400,4350.54 ; X1.2@1468,4279.45 1468,4295.2 X1.4@1542.8,4370 1561.8,4389 v1(1582,4389) C34.1@1612,4389 ; v1(1604,1283) 1604.15,1282.85 U18.4@1604.15,1216 ; v1(1865,4568) 1865,4573.31 1882.96,4591.27 U3.2@1906.75,4591.27 ; R6.2@2078,4571.54 2118.46,4571.54 v1(2119,4571) ; v1(2374,279) 2430,279 C16.1@2431,280 ; v1(2383,69) C20.1@2428,69 ; v1(2646,177) 2646.37,176.63 K1.2@2693.38,176.63 ; v1(2763,4570) 2784.6,4591.6 U5.2@2825,4591.6 ; K1.5@2866.61,467.37 2915.63,467.37 v1(2917,466) ; v1(2974,4544) 2974,4555.54 R8.2@2991,4572.54 ; Q1.2@3101.84,465 v1(3148.17,465) R14.2@3194.5,465 ; U1.9@3878,3862 v2(3897.68,3842.31) 3903,3837 U1.6@3987.15,3837 ; H2.4@4146.99,3061 4363.43,3061 C8.2@4466,3163.57 ; v1(4161,3672) C5.1@4232,3672 ; U16.9@4278,1199 4303,1224 U16.6@4303,1308.15
  Top Layer w50: C46.2@269,2987.9 380.9,2987.9 463,3070 H3.4@589.99,3070
  Top Layer w60: D18.1@1021.74,5000 1104,5000 1177.54,4926.46 P6.0@1177.54,4888.74 ; D22.1@2023.74,4999 2099,4999 2163.54,4934.46 P7.0@2163.54,4888.74 ; D21.1@2999.74,4999 3077,4999 3147.54,4928.46 P4.0@3147.54,4889.74 ; D20.1@3970.74,4999 4098.45,4999 P5.0@4130.09,4967.36
  Bottom Layer w15: P2.4@315.41,4810 315.41,4902.84 335.57,4923 D4.2@418.57,4923 ; P2.0@674.61,4926 P2.0@711.87,4888.74 ; P6.4@1298.41,4810 1298.41,4905.7 1316.72,4924 D6.2@1401.57,4924 ; P6.0@1657.61,4926 P6.0@1694.87,4888.74 ; P7.0@2163.54,4888.74 P7.0@2194.88,4920.08 ; P7.4@2284.41,4810 2284.41,4887.41 2317,4920 D14.2@2387.57,4920 ; P7.0@2649.93,4919.68 P7.0@2680.87,4888.74 ; P4.4@3268.41,4811 3268.41,4897.41 3288,4917 D16.2@3372.57,4917 ; P4.0@3637.23,4917.38 P4.0@3664.87,4889.74
  Bottom Layer w30: C47.1@590,5007 621,5007 711.87,4916.13 P2.0@711.87,4888.74 ; v1(1243,3979) 1263,3999 C25.1@1287,3999 ; C26.1@1292,4119 v1(1292,4148) ; C11.1@1403,4131 1403,4082 U2.0@1417,4068 ; U2.0@1417,3972 1430.55,3958.45 C27.1@1430.55,3921.02 ; C28.1@1513.23,3921.02 1513.23,3971.77 U2.0@1513,3972 1576.37,3972 C18.2@1591,3957.37 ; C48.1@1576,5005 1616,5005 1694.87,4926.13 P6.0@1694.87,4888.74 ; C10.1@1590,4131 1590,4195 v1(1590,4250) ; C19.1@1591,4020 C18.2@1591,3957.37 ; C18.2@1593.37,3955 C18.2@1591,3957.37 ; C49.1@2559,5001.68 2595.32,5001.68 2680.87,4916.13 P7.0@2680.87,4888.74 ; C50.1@3537,4998.38 3580.62,4998.38 3637.23,4941.77 P4.0@3637.23,4917.38
  other v1: 4454,643 3450,647 3498,647 3545,647 2794,656 2883,656 2930,656 2978,656 2635,658 4454,690 2794,704 2635,705 4454,738 4375,781 4375,828 4375,876 520,913 568,913 615,913 1571,933 1571,984 1199,1002 4471,1028 1198,1075 4471,1076 3609,1485 3609,1533 4447,1571 3609,1580 4378,1619 4447,1619 4447,1666 3756,1932 3870,1933 200,3143 3385,3740 3432,3740 3480,3740 -108,3780 3385,3800 3432,3800 3480,3800 4454,4063 4454,4110 1930,4143 2004,4145 4454,4158 4325,4161 4325,4208 4325,4256 1400.8,4274.4 1369.1,4314.9 1610,4319 1369.1,4408.8 1611,4442.9 1545.7,4444.1 1402.1,4445.6 1470.3,4446.6 452.7,4678.7 2422.2,4691.8 3320,4707
  other v2: 4258.32,1179.31 4297.69,1179.31 4258.32,1218.68 4297.69,1218.68 3858.31,3842.31 3858.31,3881.68 3897.68,3881.68
HUB_CC/GPIO1: U2.12
NetC1_1: C1.1 DV2.1 L1.1 U1.8
NetC1_2: C1.2 U1.1 | length 124.2
  Top Layer w30: U1.1@3768.85,3937 3768.85,3988.85 C1.2@3820,4040
NetC5_2: C5.2 R1.1 U1.5 | length 264.7
  Top Layer w20: U1.5@3987.15,3787 4094.5,3787 R1.1@4126,3818.5 4215.5,3818.5 C5.2@4232,3802
NetC14_1: C14.1 C43.1 L4.2 U4.1 | length 321.7
  Top Layer w30: U4.1@21,3043.15 21,3099 -38,3158 -38,3160 C43.1@-38,3226 75,3226 L4.2@76,3227
NetC22_2: C22.2 C39.2 L3.2 R15.1 U7.13 U7.20 | length 623.9
  Top Layer w12: U7.13@154.87,3340.91 154.87,3235.13 C39.2@161,3229 251.32,3229 L3.2@333,3229 ; L3.2@334,3228 371,3265 371,3326 356.09,3340.91 U7.20@334,3340.91 334,3403 382,3451 R15.1@433,3451
NetC40_2: C40.2 R15.2 U7.6 | length 398.9
  Top Layer w12: U7.6@206.05,3648 206.05,3568.95 250.5,3524.5 433,3524.5 C40.2@507.5,3524.5
NetC41_1: C41.1 U7.10 X2.3 | length 304.9
  Top Layer w10: X2.3@-109,3664.5 -106,3661.5 -106,3625.25 ; C41.1@-106,3580 -106,3625.25 ; U7.10@103.68,3648 75,3648 52.25,3625.25 -106,3625.25
NetC42_1: C42.1 U7.9 X2.1 | length 283.3
  Top Layer w10: C42.1@-38,3809 -6,3777 X2.1@-6,3742.5 10.5,3726 101,3726 129.28,3697.72 U7.9@129.28,3648
NetC44_1: C44.1 C45.1 L5.1 U4.8 | length 332.9
  Top Layer w30: U4.8@21,2824.85 21,2759 -37.5,2700.5 -41,2697 C44.1@-41,2635 75,2635 L5.1@76,2634
NetC46_1: C46.1 D19.2 H3.2 L5.2 | length 3841.1
  Top Layer w30: L5.2@76,2704 76,2751 175.1,2850.1 C46.1@269,2850.1
  Top Layer w60: C46.1@269,2850.1 570.1,2850.1 590,2870 1075,2870 1273,3068 1273,3330 1424,3481 3132.6,3481 3235.6,3584 D19.2@3235.6,3720
NetC65_1: C65.1 DV1.1 L10.1 U16.8
NetC65_2: C65.2 U16.1 | length 134.5
  Top Layer w20: C65.2@4086,1132 4128.15,1089.85 U16.1@4203,1089.85
NetC69_2: C69.2 R42.1 U16.5 | length 312.8
  Top Layer w20: R42.1@4323.5,1468 4323.5,1466.5 4353,1437 U16.5@4353,1308.15 4429.85,1308.15 C69.2@4475,1263
NetC76_1: C76.1 C77.2 C88.1 D11.1 P9.1 R45.1 | length 1425.1
  Top Layer w20: C77.2@247.56,1104.45 R45.1@551.74,1104.45
  Top Layer w60: C77.2@241,1111 241,876 241,522 241,510 329,422 ; P9.1@349.42,149 349.42,401.57 329,422 ; D11.1@443,422 329,422
NetC85_2: C85.2 U17.5 | length 127
  Top Layer w30: U17.5@784.65,861 784.65,926.65 C85.2@828,970
NetC94_1: C94.1 C95.1 L12.2 U18.8 | length 280.9
  Top Layer w20: C95.1@1271,1037 1271,970 C94.1@1270,969 1385,969 L12.2@1386,970 1385.85,970.15 U18.8@1385.85,1066
NetD1_1: D1.1 D3.1 F2.2
NetD8_1: D8.1 D9.1 F1.2 P10.19 P10.20 | length 3896.3
  Top Layer w60: P10.19@4600.79,98.43 P10.20@4600.79,198.43 4600.79,213.79 4694,307 4694,2029 4868,2203 4868,3710 F1.2@4868,3884
  other v1: 4834,3710 4882,3710 4929,3710
NetD10_2: D10.2 F1.1 F2.1 P3.1
  other v3: 4593,4183 4679,4183
NetD11_2: D11.2 L11.2 Q2.2
NetH1_1: H1.1 K1.6 | length 657.6
  Top Layer w35: K1.6@2779.99,467.37 2779.99,404.7 2857.44,327.25 3121.75,327.25 3200.99,248.01 H1.1@3200.99,139.01
NetH1_2: H1.2 K1.3 | length 428.1
  Top Layer w35: K1.3@2779.99,176.63 2779.99,214.99 2825,260 2980,260 H1.2@3101,139.01
NetH2_2: H2.2 R18.1 | length 497
  Bottom Layer w10: H2.2@4146.99,2861 4274,2861 4338,2797 R18.1@4338,2517.5
NetH2_3: H2.3 R19.1 | length 652.7
  Bottom Layer w10: H2.3@4146.99,2961.01 4316.99,2961.01 4414,2864 R19.1@4414,2518.5
NetH3_3: H3.3 U4.7 | length 715.5
  Top Layer w10: U4.7@-29,2824.85 -29,2887 2,2918 538,2918 H3.3@590,2970.01
NetK1_8: K1.8 Q1.3 | length 541.6
  Top Layer w20: K1.8@2567,467.37 2567,486 2617,536 2934,536 2999.33,470.67 Q1.3@2999.33,427.75
NetLED1_1: LED1.1 R11.1 | length 74.7
  Top Layer w10: R11.1@1059,4607 1128,4607 LED1.1@1132,4603
NetLED2_1: LED2.1 R12.1 | length 71.9
  Top Layer w6: LED2.1@1714,4604 LED2.1@1721,4611
  Top Layer w12: LED2.1@1721,4611 R12.1@1783,4611
NetLED5_1: LED5.1 R46.1 | length 108
  Top Layer w15: R46.1@2581,901.5 2581,795.25 LED5.1@2582.26,794
NetP1_1: P1.1 R4.1 | length 178
  Top Layer w15: P1.1@791,4400 R4.1@791,4578
NetP3_2: P3.2 P5.1
NetP10_1: P10.1 U18.1 | length 2580.6
  Top Layer w10: U18.1@1604.15,1066 1852,1066 v1(1945,973)
  Bottom Layer w10: v1(1945,973) 2289,629 2289,487 2568,208 3429,208 3538.57,98.43 P10.1@3700.79,98.43
NetP10_2: P10.2 U18.2 | length 2557.5
  Top Layer w10: U18.2@1604.15,1116 1843,1116 v1(1944,1015)
  Bottom Layer w10: v1(1944,1015) 2318,641 2318,503 2584,237 3505,237 3543.57,198.43 P10.2@3700.79,198.43
NetP10_3: P10.3 R13.1 R14.1 | length 794.2
  Top Layer w10: R14.1@3267.5,465 3267.5,391 R13.1@3266.5,390 3335.5,321 3687,321 3751,257 3751,148.21 P10.3@3800.79,98.43
NetP10_4: P10.4 U18.3 | length 2676.5
  Top Layer w10: U18.3@1604.15,1166 1832,1166 1986,1012 v1(1987,1012)
  Bottom Layer w10: v1(1987,1012) 2345,654 2345,519 2599,265 3734.21,265 P10.4@3800.79,198.43